# Altium PCB PCB1_rev2.PcbDoc
Units mil, origin at the board's own origin, x right, y up, seen from the top; angles counter-clockwise.
Board outline 3149.61 x 2940 mil, 6 copper layers (Top Layer, Layer 1, Layer 3, Layer 4, Layer 2, Bottom Layer), stack 32.112 mil thick; 63 components, 38 nets, 175 pads, 41 vias.
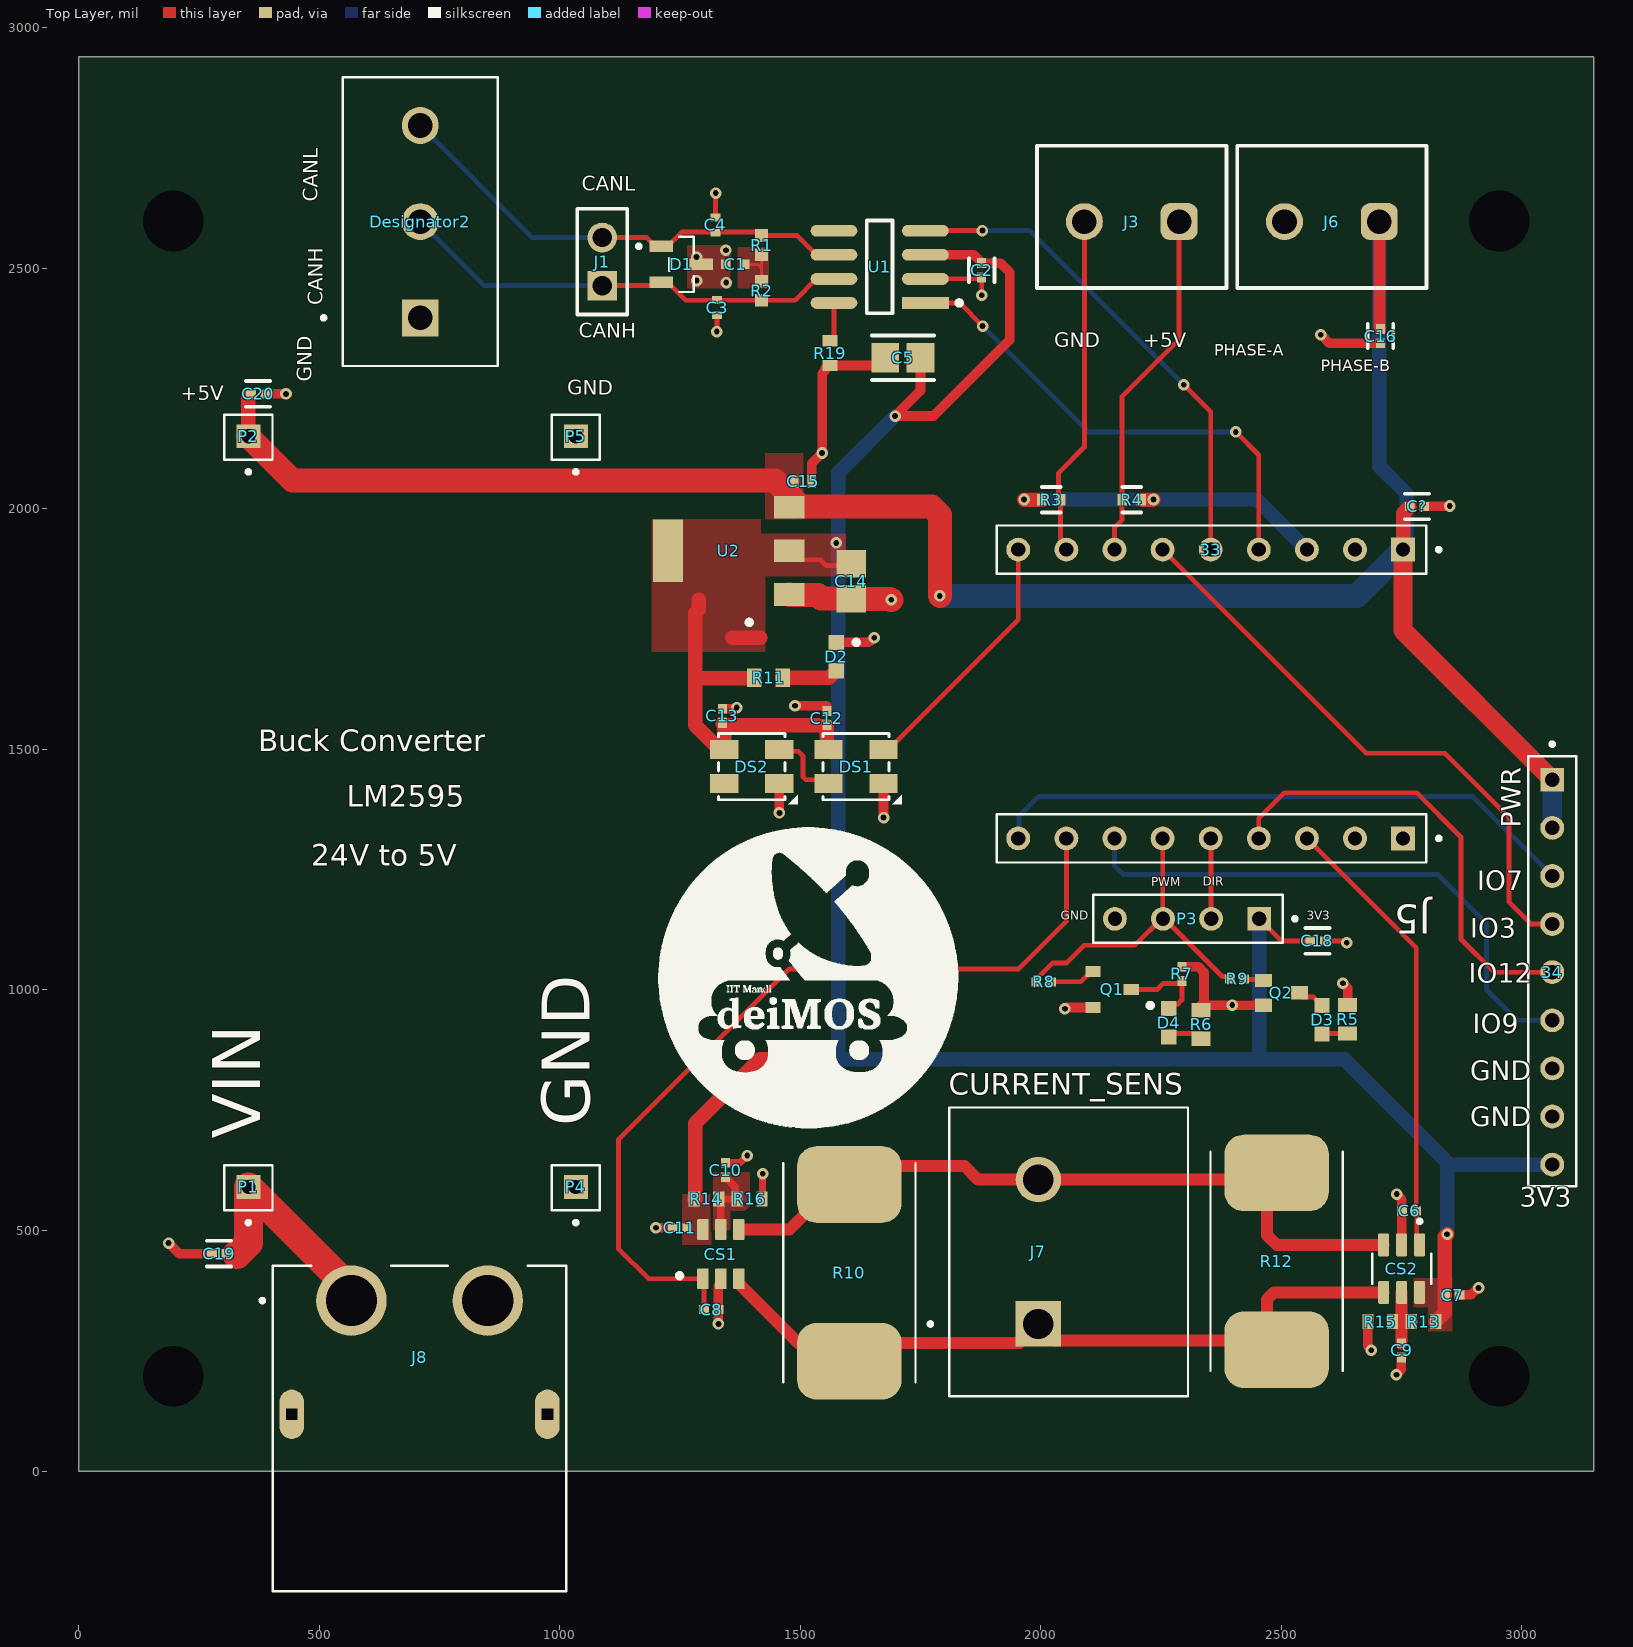
[diagram p0: Top Layer view]
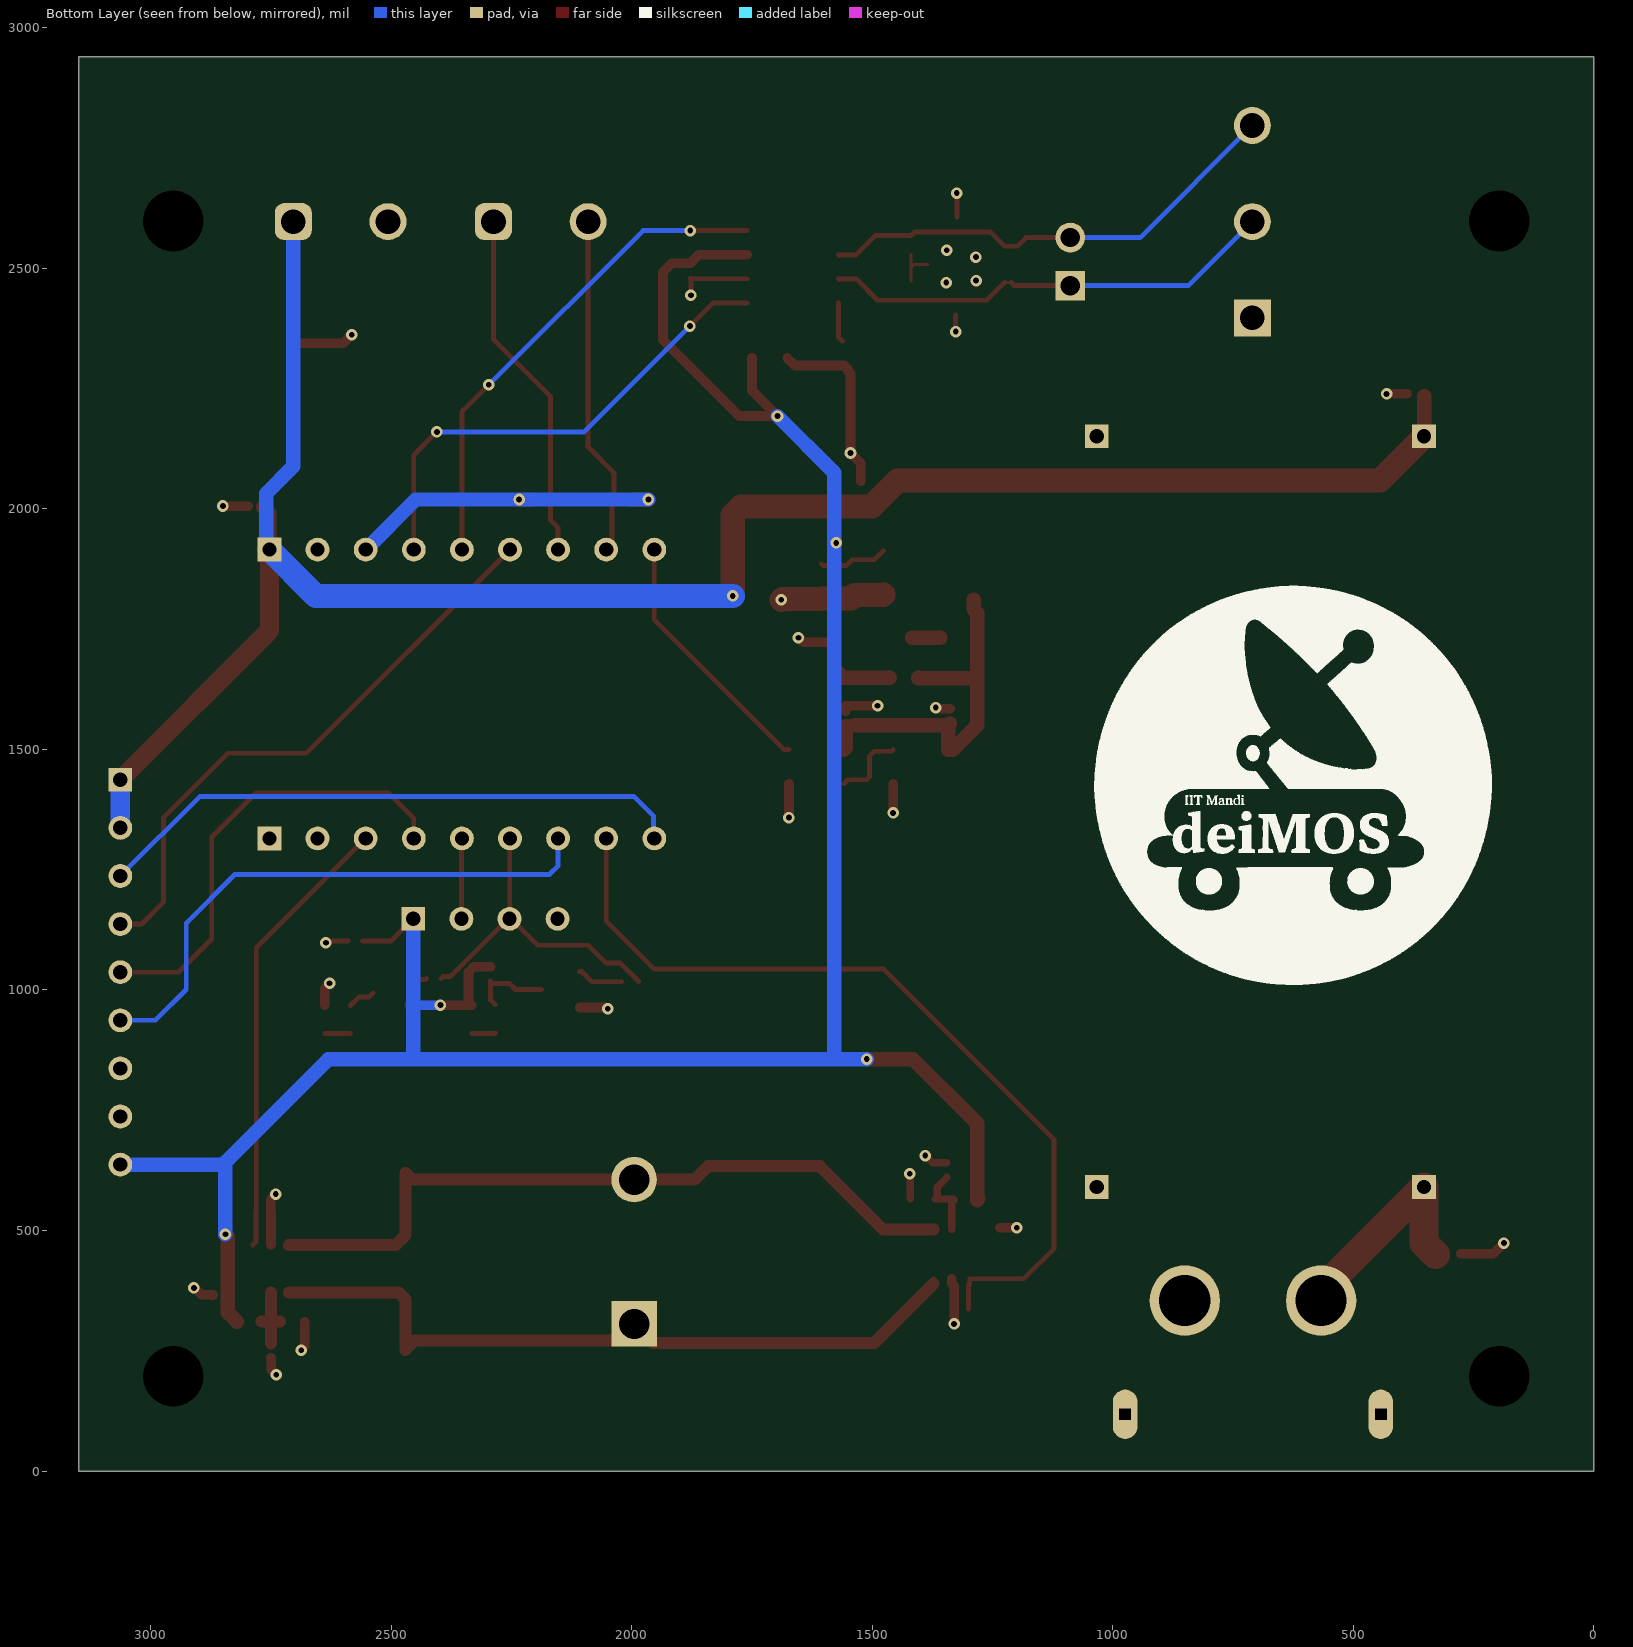
[diagram p1: Bottom Layer view, seen from below]
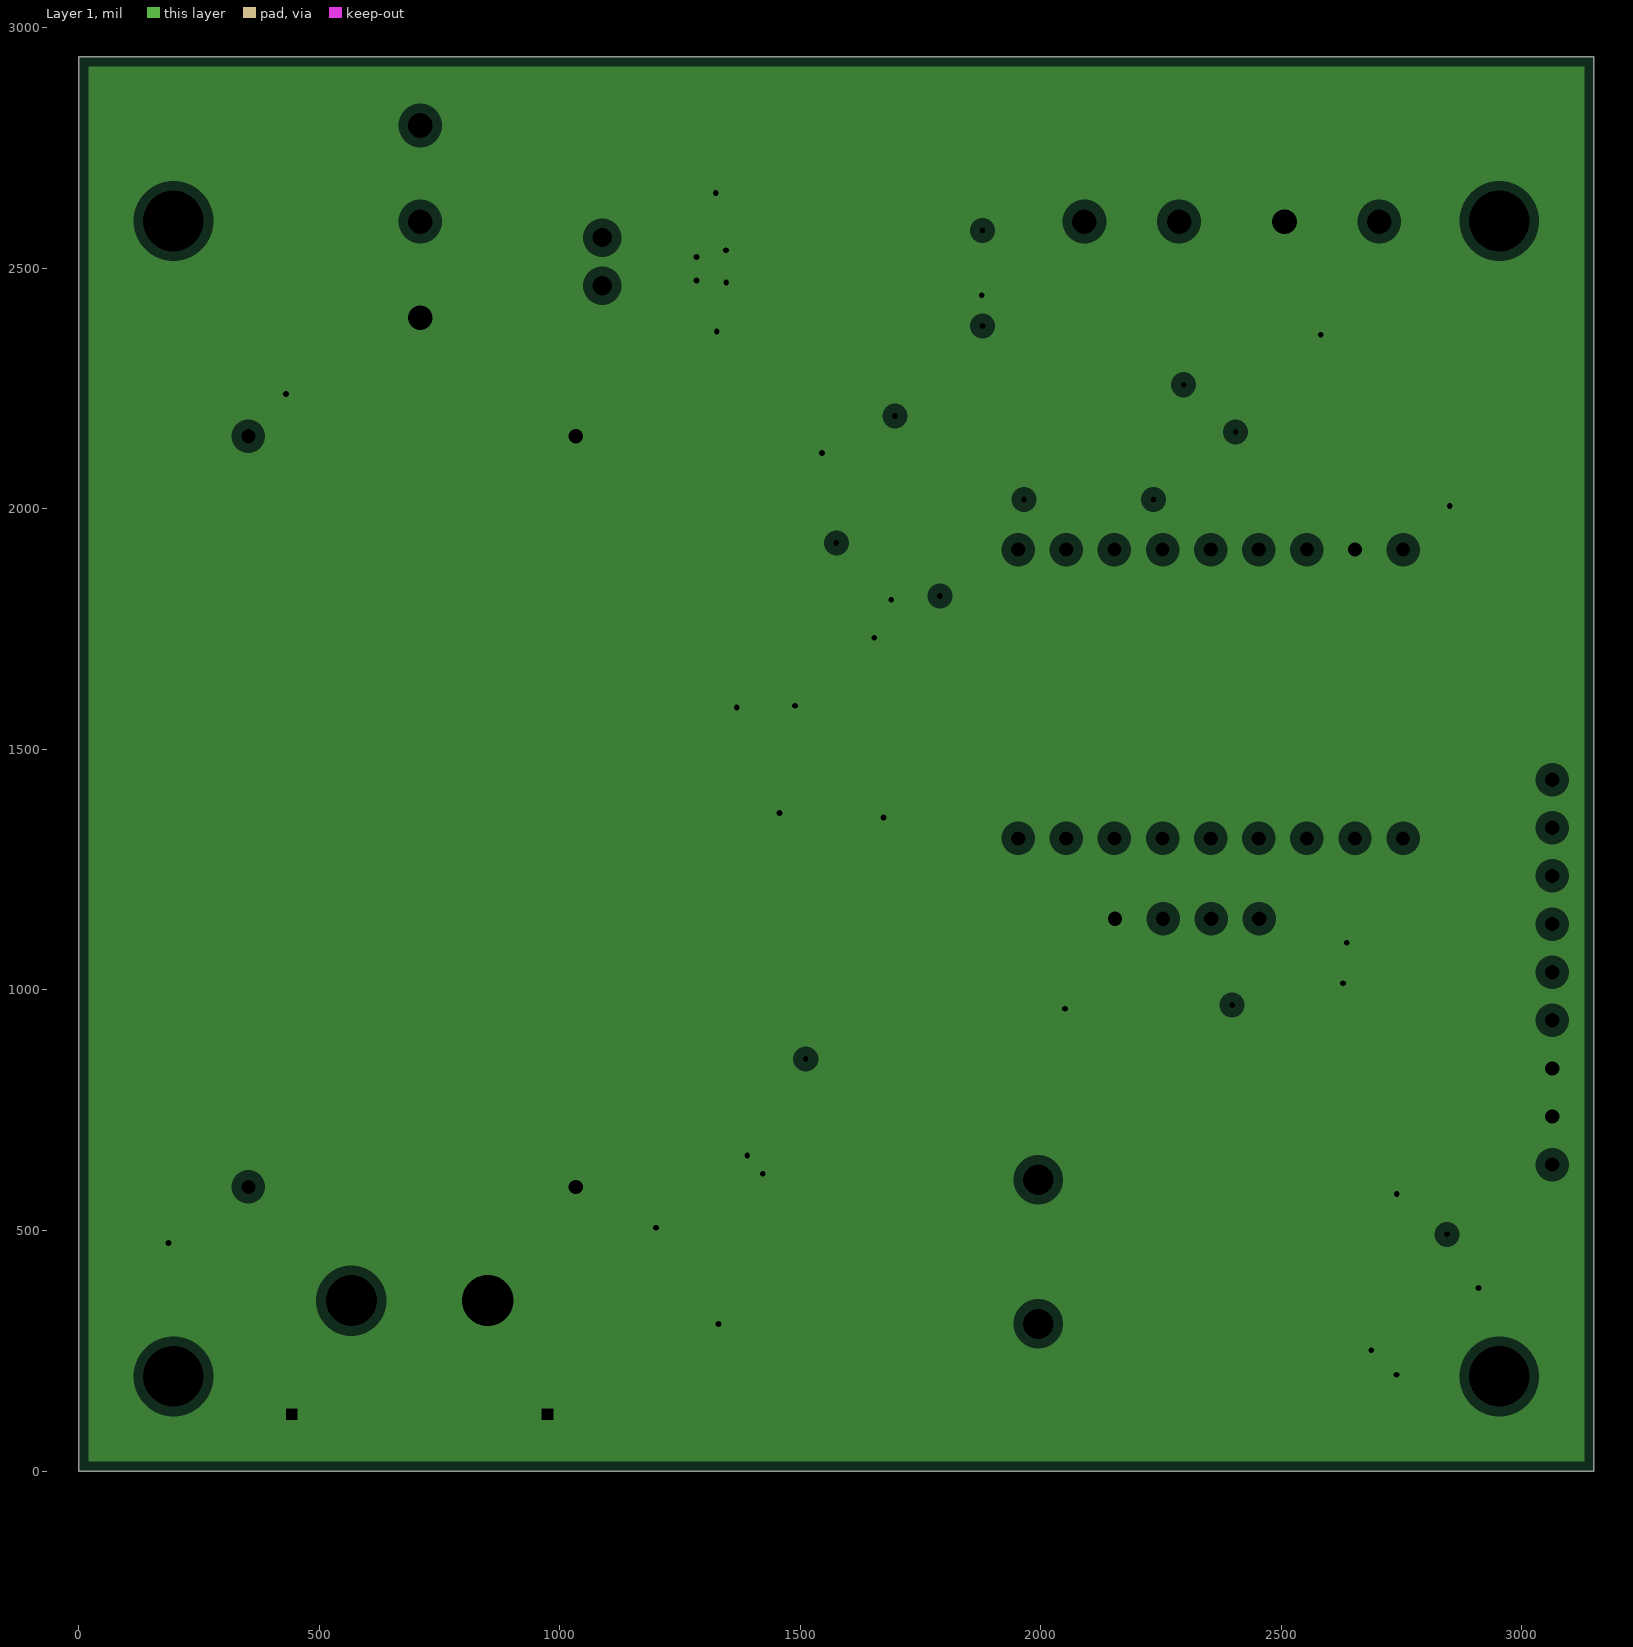
[diagram p2: Layer 1, clearances drawn from the general rule]
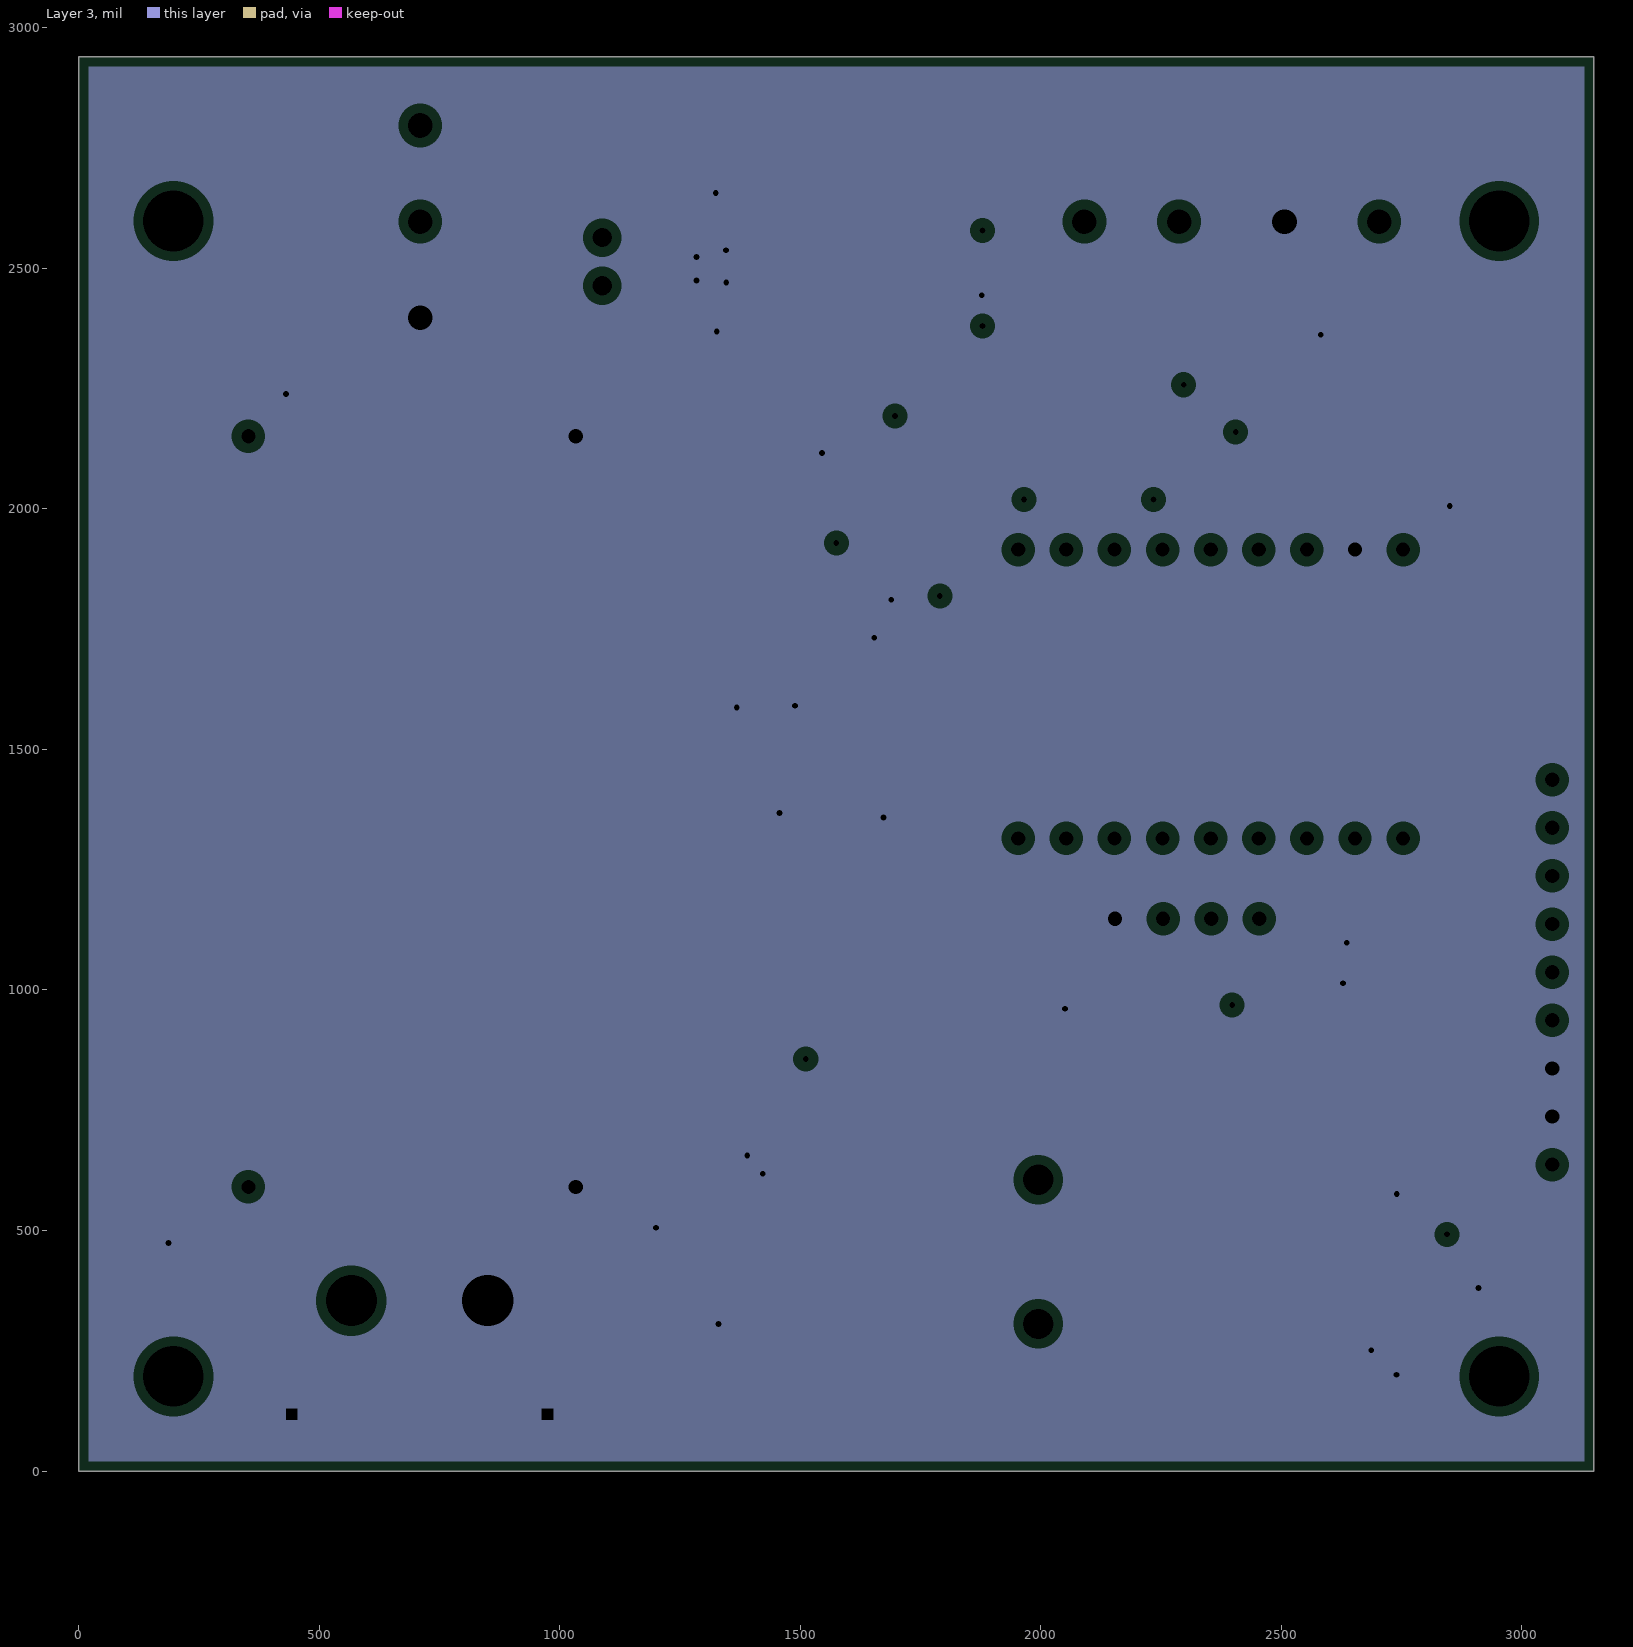
[diagram p3: Layer 3, clearances drawn from the general rule]
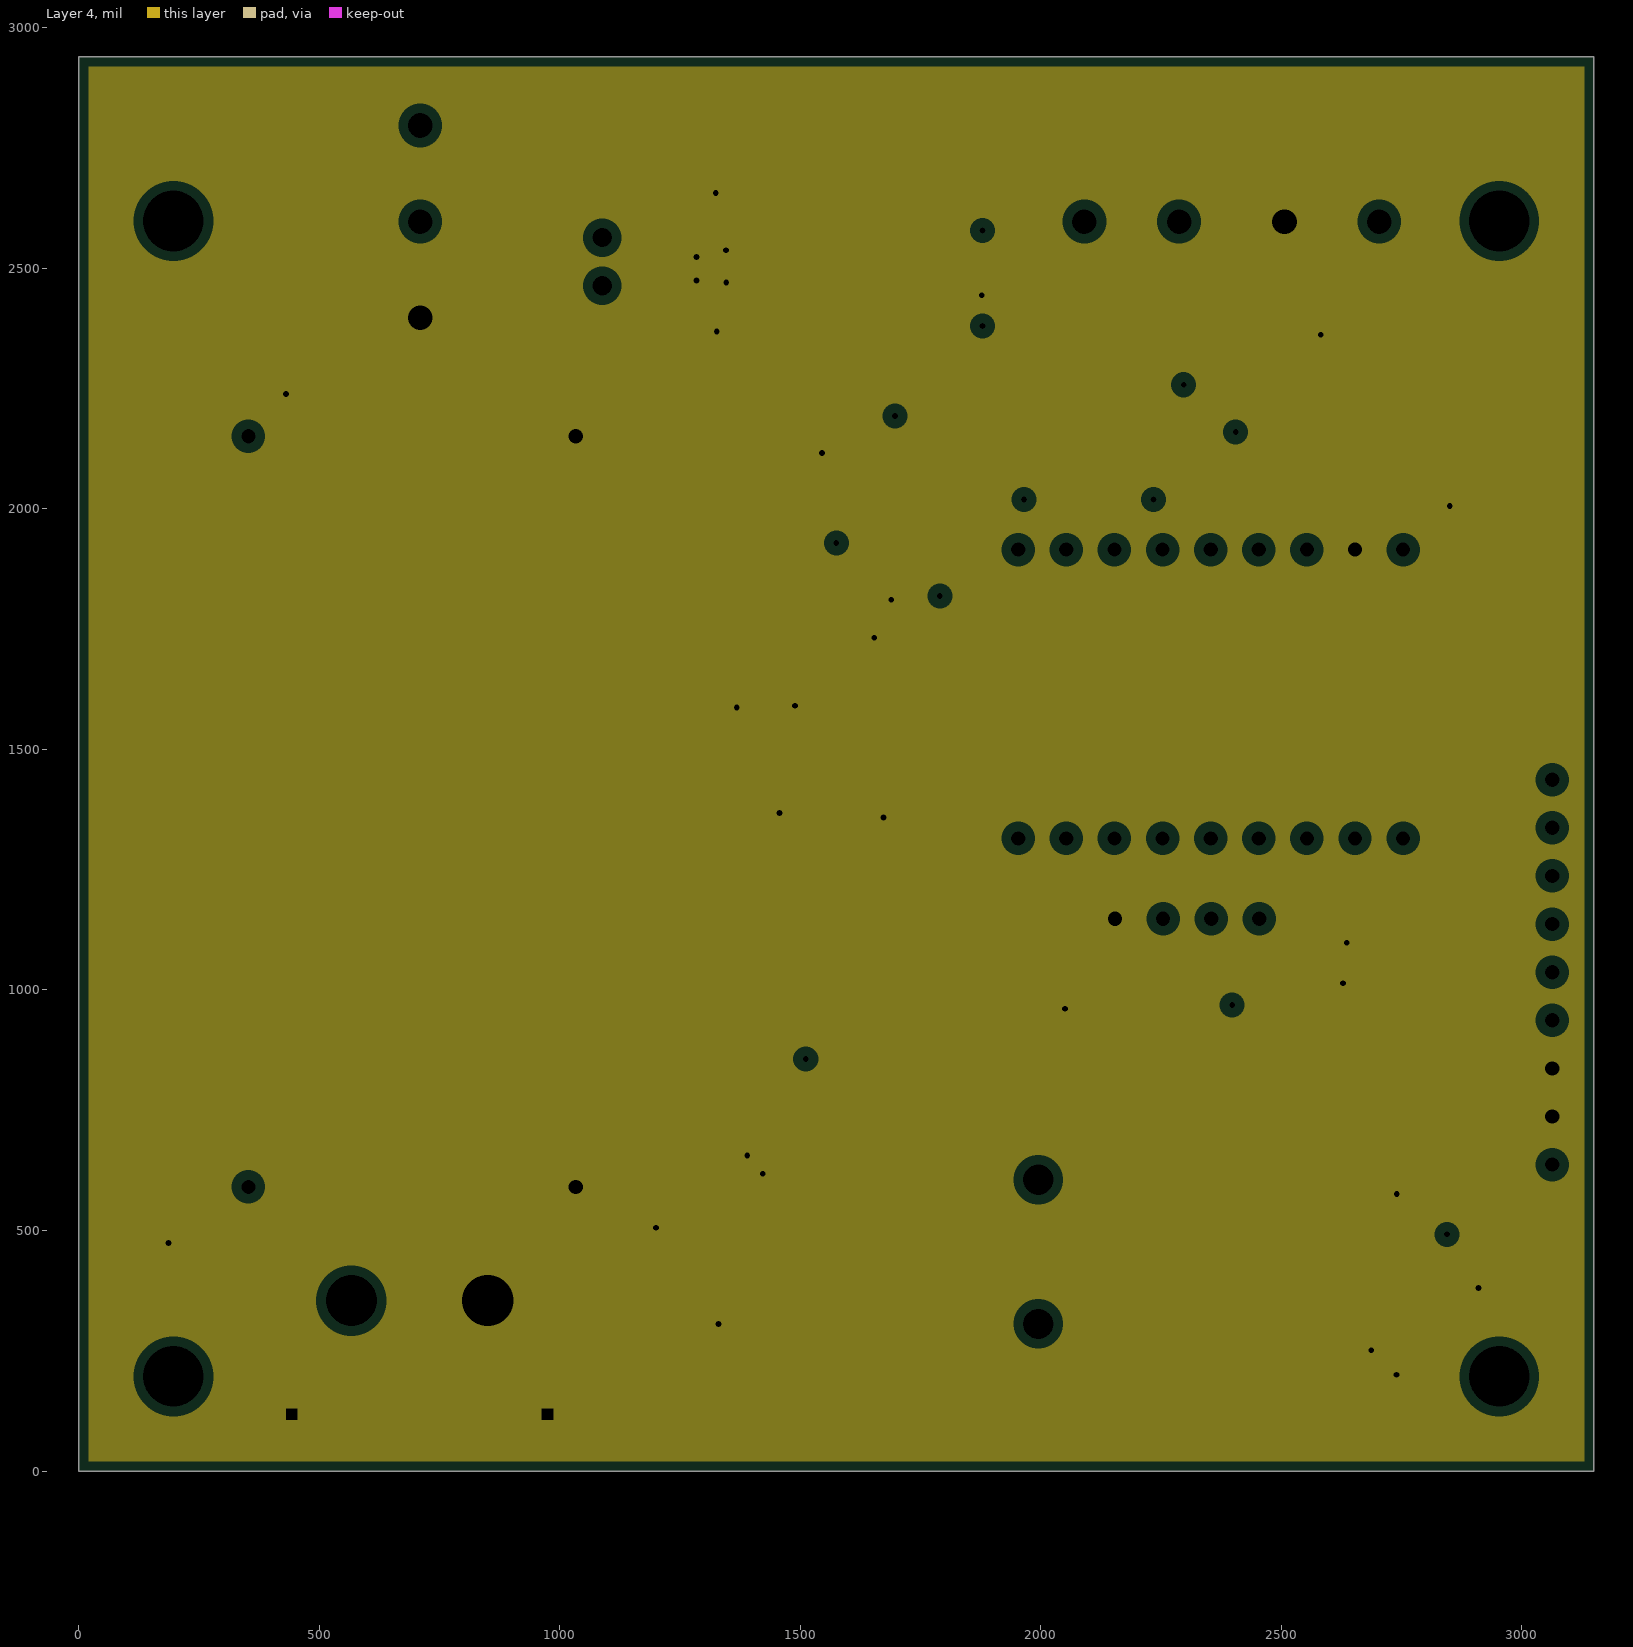
[diagram p4: Layer 4, clearances drawn from the general rule]
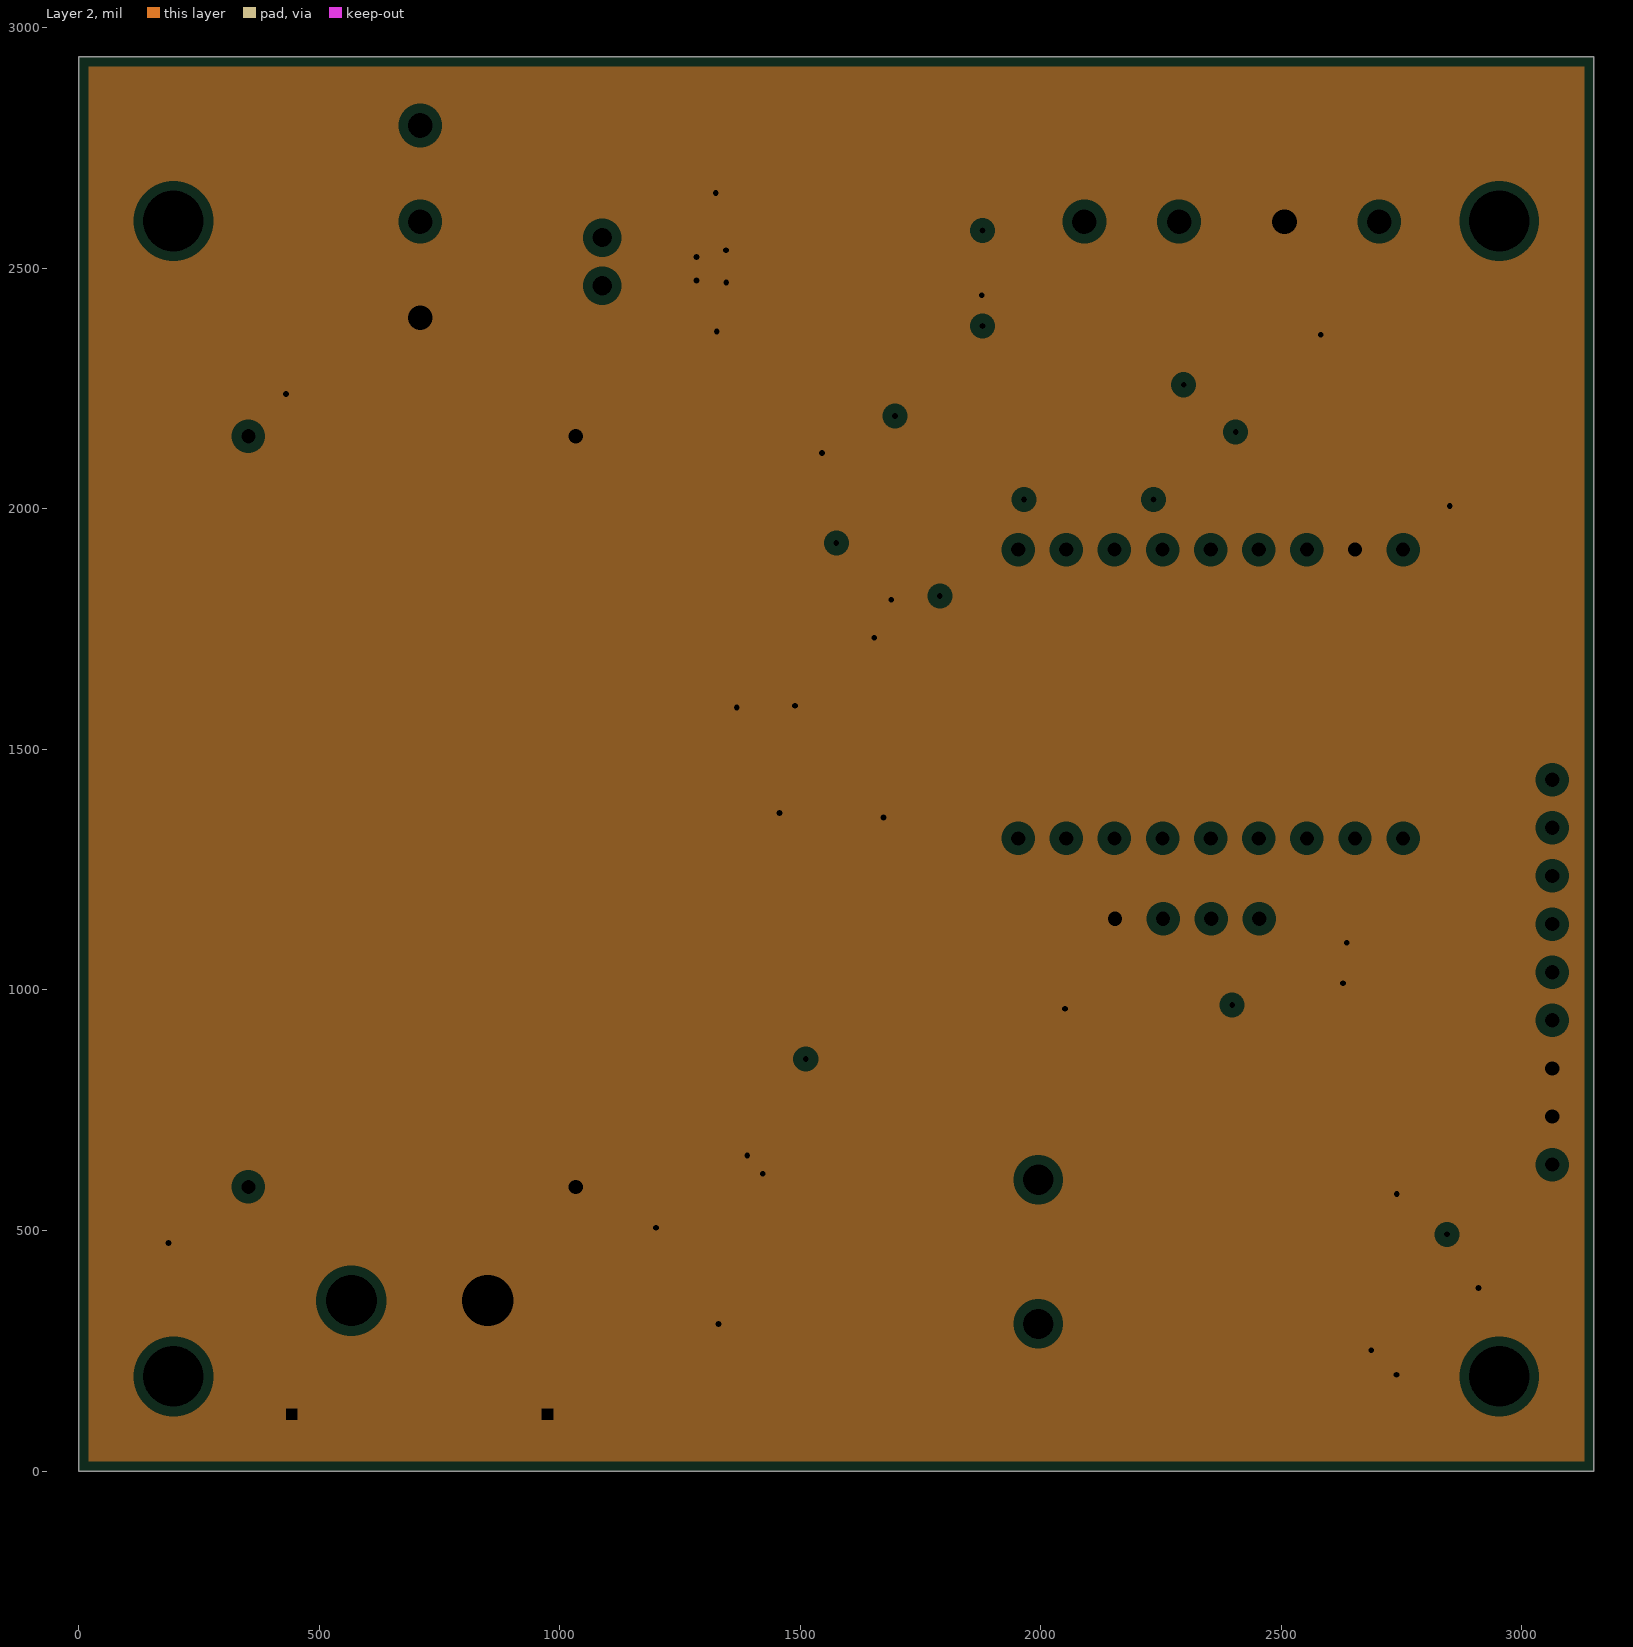
[diagram p5: Layer 2, clearances drawn from the general rule]
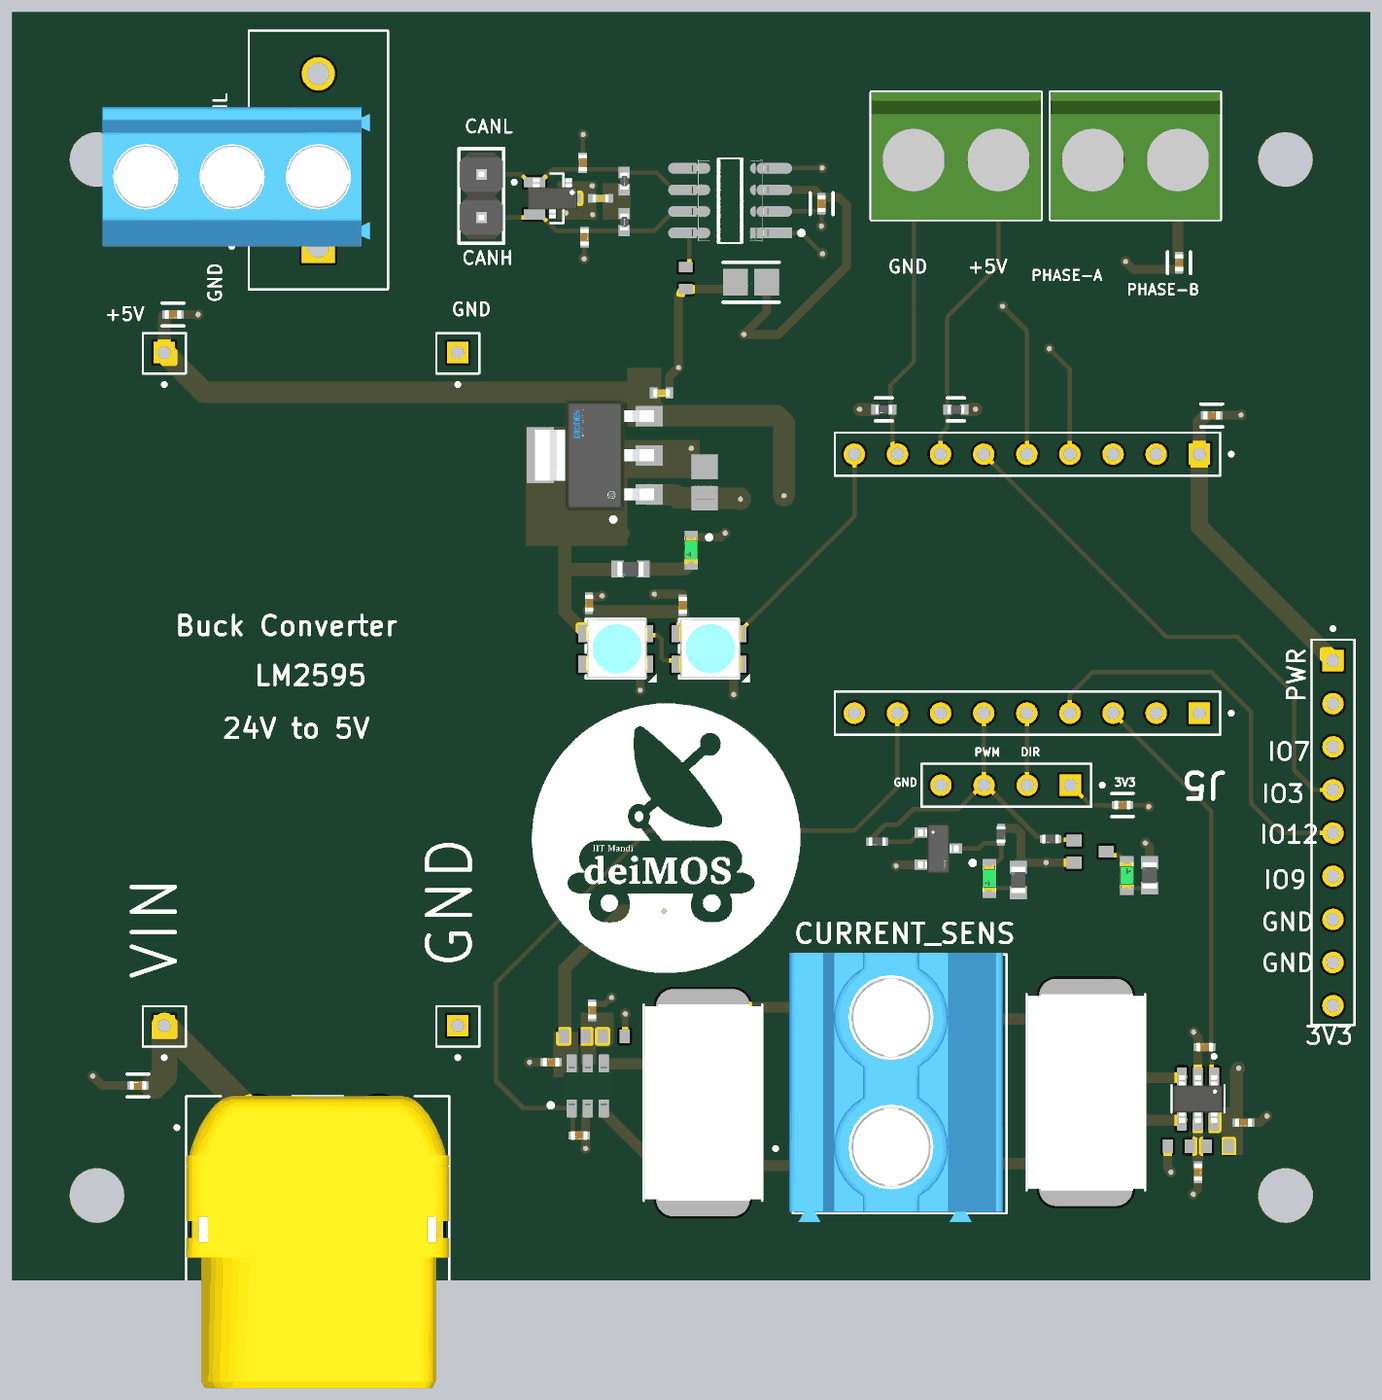
[diagram p6: 3D render of the assembled board from above, using the file's embedded part models]

## Layer stack, top to bottom
Top Solder: solder mask 0.4, Solder Resist, Dk 3.5
Top Layer: signal copper 1.4
Dielectric 2: prepreg 2.8, PP-006, Dk 4.1
Layer 1: plane copper 1.378, net GND
Dielectric 4: prepreg 2.8, PP-006, Dk 4.1
Layer 3: plane copper 1.378, net GND
Dielectric 1: dielectric 12.6, FR-4, Dk 4.8
Layer 4: plane copper 1.378, net GND
Dielectric 5: prepreg 2.8, PP-006, Dk 4.1
Layer 2: plane copper 1.378, net GND
Dielectric 3: prepreg 2.8, PP-006, Dk 4.1
Bottom Layer: signal copper 1.4
Bottom Solder: solder mask 0.4, Solder Resist, Dk 3.5

## Board outline
0,2940 0,0 3149.61,0 3149.61,2940

## Design rules (kind name [scope] priority, off if disabled: settings)
Clearance [All] p1: gap=6 ignorepadtopadclearanceinfootprint=FALSE
DiffPairsRouting [All] p1: maxlimit=10 minlimit=10 mostfreqgap=10 toplayer_minwidth=5 toplayer_maxwidth=15 toplayer_prefwidth=15 bottomlayer_minwidth=15 bottomlayer_maxwidth=15 bottomlayer_prefwidth=15 maxuncoupledlength=500
HoleSize [All] p1: absolutevalues=TRUE maxlimit=157.48 minlimit=1 maxpercent=80.000 minpercent=20.000
MinimumSolderMaskSliver [All] p1: minsoldermaskwidth=5.91
PlaneClearance [All] p1: clearance=20
PlaneConnect [All] p1: pad.planeconnectstyle=Relief pad.reliefexpansion=20 pad.reliefentries=4 pad.reliefconductorwidth=10 pad.reliefairgap=10 via.planeconnectstyle=Direct via.reliefexpansion=20 via.reliefentries=4 via.reliefconductorwidth=10 via.reliefairgap=10
PolygonConnect [All] p1: connectstyle=Direct reliefconductorwidth=10 reliefentries=4 polygonreliefangle="90 Angle" airgapwidth=10
RoutingVias [All] p1: holewidth=12 width=24 viastyle="Through Hole" minholewidth=12 minwidth=24 maxholewidth=12 maxwidth=24
SolderMaskExpansion [All] p1: expansion=6 istentingtop=FALSE
SupplyNets "Schematic Supply Nets_5" [InNet('3V3_2')] p1: voltage=0.000
SupplyNets "Schematic Supply Nets_4" [InNet('GND')] p2: voltage=0.000
SupplyNets "Schematic Supply Nets_3" [InNet('3V3')] p3: voltage=0.000
SupplyNets "Schematic Supply Nets_2" [InNet('+5')] p4: voltage=0.000
SupplyNets "Schematic Supply Nets" [InNet('VIN')] p5: voltage=0.000
Width [All] p1: maxlimit=60 minlimit=6 preferedwidth=10
25 further rules are at their usual default settings.

## Classes and differential pairs
component class Sheet1: C5 C12 C13 C14 C15 C16 D2 DS1 DS2 J3 J6 J8 P1 P2 P4 P5 R3 R4 R11 U2 U3 U4
component class "updated sheet_1": 33 C5 C6 C7 C8 C9 C10 C11 C18 CS1 CS2 D3 D4 J5 J7 P3 Q1 Q2 R5 R6 R7 R8 R9 R10 R12 R13 R14 R15 R16
component class CAN: C1 C2 C3 C4 C5 D1 J1 J5 R1 R2 R19 U1

## Components (designator, comment, footprint, x,y, rotation, side; value= is the part's Value field where it differs from the comment)
33 "2PH1-09-UA" "2AMPHENOL_76341-322LF - DUPLICATE" 1703,1915.35 r0 top
34 "2PH1-09-UA" "2AMPHENOL_76341-322LF - DUPLICATE" 3063,387 r90 top
C1 "CC0402KRX7R6BB472" FP-CC0402-MFG 1364.53,2508.32 r0 top value="4.7 nF"
C2 "CL05B104KP5NNNC" FP-CL17-IPC_C 1877,2496 r90 top
C3 "CL05C101JB5NNNC" FP-CL05-MFG 1327.32,2418.43 r90 top value=100pF
C4 "CL05C101JB5NNNC" FP-CL05-MFG 1323.32,2590.43 r270 top value=100pF
C5 "CL21A226MQQNNNE" FP-CL21-IPC_A 1713.45,2314 r0 top
C6 "CL05A104KA5NNNC" FP-CL278-IPC_C 2765.47,540.79 r180 top
C7 "CL05A104KA5NNNC" FP-CL278-IPC_C 2855.47,365.79 r0 top
C8 "CL05A104KA5NNNC" FP-CL278-IPC_C 1314.88,335.79 r0 top
C9 "CL05A104KA5NNNC" FP-CL278-IPC_C 2749.88,250.79 r90 top
C10 "CL05A104KA5NNNC" FP-CL278-IPC_C 1344.88,625.79 r270 top
C11 "CL05A104KA5NNNC" FP-CL278-IPC_C 1249.88,505.79 r180 top
C12 "CL05A104KA5NNNC" FP-CL278-IPC_C 1555.12,1564.96 r270 top
C13 "CL05A104KA5NNNC" FP-CL278-IPC_C 1337.88,1569.6 r270 top
C14 "CL21A226MQQNNNE" FP-CL21-IPC_A 1606,1849.55 r270 top
C15 "CL05A106MP5NUNC" FP-CL05A106MP5NUNC-MFG 1505.91,2057.09 r0 top value=10uF
C16 "CL05A104KA5NNNC" FP-CL278-IPC_C 2706,2359 r270 top
C18 "CL05A104KA5NNNC" FP-CL278-IPC_C 2575,1102 r180 top
C19 "CL05A104KA5NNNC" FP-CL278-IPC_C 292,452 r180 top
C20 "CL05A104KA5NNNC" FP-CL278-IPC_C 373,2239 r0 top
C? "CL05A104KA5NNNC" FP-CL278-IPC_C 2781.9,2005 r180 top
CS1 "INA181A1IDBVR" FP-DBV0006A-MFG 1334.88,450.79 r90 top
CS2 "INA181A3IDBVR" SOT95P280X145-6N 2749.88,420.79 r270 top
D1 "ESD2CAN24DBZRQ1" SOT95P237X112-3N 1252.99,2508.32 r0 top
D2 "VLMS1300-GS08" FP-6_541-5092_01-4-MFG 1574.8,1692.91 r270 top
D3 "VLMS1300-GS08" FP-6_541-5092_01-4-MFG 2584.52,938.38 r90 top
D4 "VLMS1300-GS08" FP-6_541-5092_01-4-MFG 2265.89,931.72 r270 top
Designator2 "Comment" CUI_TB006-508-03BE 710,2397 r90 top
DS1 "SK6812MINI-HS" LED 1614.17,1466.54 r0 top
DS2 "SK6812MINI-HS" LED 1397.64,1466.54 r0 top
J1 "M20-9990246" FP-M20-9990246-MFG 1088.32,2514 r90 top
J3 "691137710002" 691137710002 2189,2607 r180 top
J5 "2PH1-09-UA" "2AMPHENOL_76341-322LF - DUPLICATE" 1703,1315 r0 top
J6 "691137710002" 691137710002 2605,2607 r180 top
J7 "TB005-762-02BE" CUI_TB005-762-02BE 1994.88,305.79 r90 top
J8 "XT60PW-F" AMASS_XT60PW-F 708.66,354.33 r0 top
P1 "Header-Male-2.54_1x1" PCBCOMPONENT_1 352.9,590.55 r270 top
P2 "Header-Male-2.54_1x1" PCBCOMPONENT_1 352.9,2150.79 r270 top
P3 "Header-Female-2.54_1x4" "4 PIN CONNECTOR MALE" 1554,993 r0 top
P4 "Header-Male-2.54_1x1" PCBCOMPONENT_1 1033.46,590.55 r270 top
P5 "Header-Male-2.54_1x1" PCBCOMPONENT_1 1033.46,2150.79 r270 top
Q1 "SS8050-G" FP-SS8050-G-MFG 2148,1001 r0 top
Q2 "SMMBT3906WT1G" ONSC-SC-70-3-419-04_V 2500,994.09 r0 top
R1 "ERJ-2RKF60R4X" FP-ERJ2RK-IPC_A 1419.53,2548.32 r270 top
R2 "ERJ-2RKF60R4X" FP-ERJ2RK-IPC_A 1419.53,2453.32 r90 top
R3 "RC0402JR-074K7L" FP-RC0402-0_4-MFG 2021.36,2019 r180 top
R4 "RC0402JR-074K7L" FP-RC0402-0_4-MFG 2188.68,2019 r0 top
R5 "CRCW06031K00FKEA" FP-CRCW0603-e3-MFG 2637.8,938.98 r90 top
R6 "CRCW06031K00FKEA" FP-CRCW0603-e3-MFG 2333.32,928.28 r90 top
R7 "RC0402JR-0710KL" FP-RC0402-0_4-IPC_C 2293.31,1033.46 r270 top
R8 "RC0402JR-0710KL" FP-RC0402-0_4-IPC_C 2006,1017 r180 top
R9 "RC0402JR-0710KL" FP-RC0402-0_4-IPC_C 2408,1023 r180 top
R10 "WSR32L000FEA" RESM11569X253N 1602,412 r90 top value=2mR
R11 "CRCW06031K00FKEA" FP-CRCW0603-e3-MFG 1434,1649 r180 top
R12 "WSR32L000FEA" RESM11569X253N 2490,436 r90 top value=2mR
R13 "RC0603FR-1010KL" RESC1608X55X25LL10T15 2795.47,310.79 r0 top
R14 "RC0603FR-1010KL" RESC1608X55X25LL10T15 1304.88,565.79 r180 top
R15 "RC0603FR-1010KL" RESC1608X55X25LL10T15 2705.47,310.79 r0 top
R16 "RC0603FR-1010KL" RESC1608X55X25LL10T15 1394.88,565.79 r180 top
R19 "RC0603FR-1010KL" RESC1608X55X25LL10T15 1562,2323.59 r90 top
U1 "SN65HVD230DR" FP-D0008A-IPC_A 1665,2503 r180 top
U2 "AZ1117CH-3.3TRG1" FP-SOT223-MFG 1350.88,1912.79 r180 top

## Footprints (in the part's own frame and the unit in brackets; to place one, negate y for a bottom-side part, rotate by r counter-clockwise, add the part's x,y. Pads: shape width x height; smd on the part's side, far side on the other; paste and mask are expansions set on the pad)
"2AMPHENOL_76341-322LF - DUPLICATE" [mm]
  rect 1.258x1.258 / inner round 1.258 / far side rect 1.258x1.258 hole 0.75: 1(26.67,0)
  round 1.258 hole 0.75: 2(24.13,0) 3(21.59,0) 4(19.05,0) 5(16.51,0) 6(13.97,0) 7(11.43,0) 8(8.89,0) 9(6.35,0)
  silkscreen extent 5.21,-1.27 28.65,1.27
"4 PIN CONNECTOR MALE" [mil]
  rect 49.53x49.53 / inner round 49.53 / far side rect 49.53x49.53 hole 29.53: 1(900,155)
  round 49.53 hole 29.53: 2(800,155) 3(700,155) 4(600,155)
  silkscreen extent 555,105 978,205
691137710002 [mm] "Horizontal Cable Entry with Pressure Clamp, pitch 5mm, 02p"
  rrect50% 1.95x1.95 hole 1.3: 1(-2.5,0.25)
  round 1.95 hole 1.3: 2(2.5,0.25)
  silkscreen extent -5,-3.75 5,3.75, body extent -5,-3.75 5,3.75, height 11.6
AMASS_XT60PW-F [mm]
  round 3.716 hole 2.7: 1(-3.6,0) 2(3.6,0)
  oval 1.3x2.6 hole 0.6 square: S1(-6.75,-6) S2(6.75,-6)
  silkscreen extent -8.4,-15.35 7.75,1.85, body extent -7.75,-15.35 7.75,1.85, height 8.4
CUI_TB005-762-02BE [mm]
  rect 2.4x2.4 / inner round 2.4 / far side rect 2.4x2.4 hole 1.6: 1(0,0)
  round 2.4 hole 1.6: 2(7.62,0)
  silkscreen extent -3.81,-7.9 11.43,5.8, body extent -4.32,-7.7 11.52,4.9, height 21.7
CUI_TB006-508-03BE [mm]
  rect 1.95x1.95 / inner round 1.95 / far side rect 1.95x1.95 hole 1.3: 1(0,0)
  round 1.95 hole 1.3: 2(5.08,0) 3(10.16,0)
  silkscreen extent -2.54,-4.1 12.7,5.2, body extent 0,-3.04 8.2,12.7, height 10
FP-6_541-5092_01-4-MFG [mm]
  rect 0.8x0.8 smd paste+0 mask+0: 1(-0.75,0) 2(0.75,0)
  silkscreen extent -0.87,0.93 -0.63,1.18, body extent -1.25,-0.6 1.25,0.6, height 0.25
FP-CC0402-MFG [mm]
  rect 0.5x0.5 smd paste+0 mask+0: 1(-0.5,0) 2(0.5,0)
  body extent -0.87,-0.48 0.87,0.48, height 0.25
FP-CL05-MFG [mm]
  rect 0.42x0.525 smd paste+0 mask+0: 1(-0.397,0) 2(0.397,0)
  body extent -0.71,-0.38 0.71,0.38, height 0.25
FP-CL05A106MP5NUNC-MFG [mm]
  rect 0.45x0.675 smd paste+0 mask+0: 1(-0.463,0) 2(0.463,0)
  body extent -0.79,-0.45 0.79,0.45, height 0.25
FP-CL17-IPC_C [mil]
  rect 20.29x18.6 smd paste+0 mask+0: 1(-14.9,0) 2(14.9,0)
  silkscreen extent -25,-27 25,27, body extent -29,-15 29,15, height 10
FP-CL21-IPC_A [mil]
  rect 57.27x61.27 smd paste+0 mask+0: 1(-36.45,0) 2(36.45,0)
  silkscreen extent -65,-46 65,46, body extent -85,-50 85,50, height 10
FP-CL278-IPC_C [mil]
  rect 20.29x18.6 smd paste+0 mask+0: 1(-14.9,0) 2(14.9,0)
  body extent -29,-15 29,15, height 10
FP-CRCW0603-e3-MFG [mm]
  rect 0.75x1 smd paste+0 mask+0: 1(-0.75,0) 2(0.75,0)
  body extent -1.22,-0.6 1.22,0.6, height 0.25
FP-D0008A-IPC_A [mil]
  rect 97.21x24.49 smd paste+0 mask+0: 1(-95.02,75)
  rrect100% 97.21x24.49 smd paste+0 mask+0: 2(-95.02,25) 3(-95.02,-25) 4(-95.02,-75) 5(95.02,-75) 6(95.02,-25) 7(95.02,25) 8(95.02,75)
  silkscreen extent -170,-97 27,97, body extent -163,-116 163,116, height 10
FP-DBV0006A-MFG [mm]
  rrect17% 1.1x0.6 smd paste+0 mask+0: 1(-1.3,0.95) 2(-1.3,0) 3(-1.3,-0.95) 4(1.3,-0.95) 5(1.3,0) 6(1.3,0.95)
  silkscreen extent -1.26,2.06 -1.01,2.31, body extent -1.95,-1.78 1.95,1.78, height 0.25
FP-ERJ2RK-IPC_A [mil]
  rect 26.31x26.48 smd paste+0 mask+0: 1(-19.77,0) 2(19.77,0)
  body extent -41,-21 41,21, height 10
FP-M20-9990246-MFG [mm]
  rect 1.57x1.57 hole 1.02 paste-2539.97 mask+0: 1(-1.27,0)
  round 1.57 hole 1.02 paste-2539.97 mask+0: 2(1.27,0)
  silkscreen extent -2.79,-1.32 2.79,1.32, body extent -2.89,-1.42 2.89,1.42, height 0.25
FP-RC0402-0_4-IPC_C [mil]
  rect 20.29x18.6 smd paste+0 mask+0: 1(-14.9,0) 2(14.9,0)
  body extent -29,-15 29,15, height 10
FP-RC0402-0_4-MFG [mm]
  rect 0.5x0.6 smd paste+0 mask+0: 1(-0.5,0) 2(0.5,0)
  silkscreen extent -0.5,-0.67 0.5,0.67, body extent -0.85,-0.4 0.85,0.4, height 0.25
FP-SOT223-MFG [mm]
  rect 1.6x1.2 smd paste+0 mask+0: 1(-3.2,2.3) 2(-3.2,0) 3(-3.2,-2.3)
  rect 1.6x3.3 smd paste+0 mask+0: 4(3.2,0)
  silkscreen extent -1.22,3.65 -0.97,3.9, body extent -4.1,-3.37 4.1,3.37, height 0.25
FP-SS8050-G-MFG [mm]
  rect 0.8x0.6 smd paste+0 mask+0: 1(-1.01,0.95) 2(-1.01,-0.95) 3(1.01,0)
  body extent -1.51,-1.6 1.51,1.6, height 0.25
LED [mm]
  rect 1.5x1 smd: 1(1.491,-0.96) 2(1.491,0.841) 3(-1.409,0.841) 4(-1.409,-0.96)
  silkscreen extent -1.71,-2.03 2.46,1.69, body extent -1.72,-1.8 1.98,1.7, height 1
ONSC-SC-70-3-419-04_V [mm] "SOT23, 3-Leads, Body 2x1.25mm, Pitch 0.65mm"
  rect 0.9x0.7 smd: 1(-0.95,0.65) 2(-0.95,-0.65) 3(0.95,0)
  body extent -0.63,-1 0.63,1, height 1
PCBCOMPONENT_1 [mm]
  rect 1.258x1.258 / inner round 1.258 / far side rect 1.258x1.258 hole 0.75: 1(0,0)
  silkscreen extent -1.14,-1.27 1.98,1.27
RESC1608X55X25LL10T15 [mm] "Chip Resistor, 2-Leads, Body 1.60x0.80mm, IPC High Density"
  rect 0.6x0.8 smd: 1(-0.65,0) 2(0.65,0)
  body extent -0.85,-0.45 0.85,0.45, height 0.55
RESM11569X253N [mm]
  rrect50% 4.04x5.51 smd: 1(-4.665,0) 2(4.665,0)
  silkscreen extent -5.78,-3.49 5.78,3.49, body extent -5.78,-3.56 5.78,3.42, height 2.42
SOT95P237X112-3N [mm]
  rect 1.24x0.59 smd: 1(-1.055,0.95) 2(-1.055,-0.95) 3(1.055,0)
  silkscreen extent -2.35,-1.46 0.65,1.46, body extent -1.18,-1.46 1.18,1.46, height 1.12
SOT95P280X145-6N [mm]
  rrect25% 1.21x0.58 smd: 1(-1.255,0.95) 2(-1.255,0) 3(-1.255,-0.95) 4(1.255,-0.95) 5(1.255,0) 6(1.255,0.95)
  silkscreen extent -2.6,-1.56 0.8,1.56, body extent -1.4,-1.45 1.4,1.45, height 1.45

## Part data
33 34: "Conn Unshrouded Header HDR 9 POS 2mm Solder ST Thru-Hole", Contact Resistance=20mΩ, Current Rating=1A, Insulation Resistance=5GΩ, Manufacturer="Adam Tech", Max Operating Temperature=105°C, Min Operating Temperature=-55°C, Supplier Part Number=2057-2PH1-09-UA-ND, Category="Card Edge Connectors", ComponentLink1Description=https://datasheet.octopart.com:443/2PH1-09-UA-Adam-Tech-datasheet-21182828.pdf?src-supplier=IHS, ComponentLink1URL=https://datasheet.octopart.com:443/2PH1-09-UA-Adam-Tech-datasheet-21182828.pdf?src-supplier=IHS, ComponentLink2Description=https://datasheet.octopart.com:443/2PH1-09-UA-Adam-Tech-datasheet-12511781.pdf?src-supplier=Future+Electronics, ComponentLink2URL=https://datasheet.octopart.com:443/2PH1-09-UA-Adam-Tech-datasheet-12511781.pdf?src-supplier=Future+Electronics, ComponentLink3Description=http://sigma.octopart.com:80/rohs_statement/Adam-Tech-company-22.pdf?src-supplier=Compliance+Statements, ComponentLink3URL=http://sigma.octopart.com:80/rohs_statement/Adam-Tech-company-22.pdf?src-supplier=Compliance+Statements, ComponentLink4Description=http://sigma.octopart.com:80/reach_statement/Adam-Tech-company-23.pdf?src-supplier=Compliance+Statements, ComponentLink4URL=http://sigma.octopart.com:80/reach_statement/Adam-Tech-company-23.pdf?src-supplier=Compliance+Statements, Contact Gender=Male, Contact Material=Brass, Lead Free="Lead Free", Lifecycle Status=Production, Manufacturer Part Number=2PH1-09-UA, Number of Rows=1, Pins=9, Pricing="1=0.17, 10=0.141, 100=0.1195, 500=0.1066, 1000=0.10151, 5000=0.0906, 10000=0.08627 (USD)", REACH SVHC=Yes, RoHS=Compliant, Stock=1766, Supplier=DigiKey, Terminal Pitch=2mm
C1: library part CMP-03422-001343-1, "CC0402 4.7 nF X7R 10.00% 10 V", Capacitance="4.7 nF", Manufacturer=YAGEO, Package=CC0402, Temperature="-55°C to +125°C", Temperature Characteristic=X7R, Temperature Coefficient=30ppm/°C, Temperature Range High=+125°C, Temperature Range Low=-55°C, Tolerance=0.1, Voltage Rating="10 V", Automotive=No, Automotive Grade=NA, Category=Cap, ComponentLink2Description=Datasheet, ComponentLink2URL=http://www.yageo.com/documents/recent/UPY-GP_NP0_16V-to-50V_16.pdf, Device Class L1="Passive Components", Device Class L2=Capacitors, Device Class L3="Ceramic Capacitors", Footprint Url=http://www.yageo.com/exep/pages/download/literatures/UPY-C_GEN_24.pdf, Height=0.55mm, Ipc Land Pattern Name=CAPC10050X50, Lead Free=Yes, Manufacturer Part Number=CC0402KRX7R6BB472, Material=Ceramic, Mouser Description="Cap Ceramic 0.0047uF 10V X7R 10% SMD 0402 125°C Paper T/R", Octopart=https://octopart.com/cc0402krx7r6bb472-yageo-90326733, RoHS=TRUE
C2: library part CMP-13271-001069-1, "Cap Ceramic 100nF 10V X7R ±10% SMD 0402 +125°C Paper T/R", Capacitance=100nF, Case Code (Imperial)=0402, Case Code (Metric)=1005, Dielectric=X7R, Max Operating Temperature=125°C, Min Operating Temperature=-55°C, Package Quantity=1, Tolerance=10%, Voltage Rating=10V, Case/Package=0402, Contact Plating=Tin, Depth=0.5mm, Height=0.5mm, Length=1mm, Mount="Surface Mount", Packaging="Tape and Reel", Radiation Hardening=No, Thickness=0.022inch, Width=0.02inch
C3 C4: library part CMP-13271-000010-1, "CAP CER 100PF 50V C0G/NP0 0402", Capacitance=100pF, Manufacturer=Samsung, Package=CL05, Temperature="-55°C to +125°C", Temperature Characteristic=C0G, Temperature Coefficient=30ppm/°C, Temperature Range High=+125°C, Temperature Range Low=-55°C, Tolerance=5%, Voltage Rating=50V, Automotive=No, Category=Cap, ComponentLink2Description=Datasheet, ComponentLink2URL=http://www.samsungsem.com/global/front/downloadcms.do?path=%2F%2Fglobal%2F%2Fsupport%2F%2Fproduct-search%2F%2Fmlcc%2F%2F__icsFiles%2F%2Fafieldfile%2F%2F2019%2F%2F06%2F%2F18&fileName=CL05C101JB5NNNC-19.pdf, Device Class L1="Passive Components", Device Class L2=Capacitors, Device Class L3="Ceramic Capacitors", Digikey Description="CAP CER 100PF 50V C0G/NP0 0402", Height=0.55mm, Ipc Land Pattern Name=CAPC10050X50, Lead Free=Yes, Manufacturer Part Number=CL05C101JB5NNNC, Material=Ceramic, Octopart=https://octopart.com/cl05c101jb5nnnc-samsung-9299367, RoHS=TRUE
C5 C14: library part CMP-13271-000185-1, "CL21 Series 0805 22uF 6.3V ±20% Tolerance X5R Multilayer Ceramic Chip Capacitor", Capacitance=22uF, Case Code (Imperial)=0805, Case Code (Metric)=2012, Dielectric=X5R, Max Operating Temperature=85°C, Min Operating Temperature=-55°C, Package Quantity=2000, Tolerance=20%, Voltage Rating=6.3V, Case/Package=0805, Contact Plating=Tin, Depth=1.25mm, Height=1.25mm, Lead Free="Lead Free", Length=2mm, Mount="Surface Mount", Packaging="Tape and Reel", Radiation Hardening=No, Thickness=0.055inch, Voltage Rating (DC)=6.3V, Width=0.049inch
C6 C7 C8 C9 C10 C11 C12 C13 C16 C18 C19 C20 C?: library part CMP-13271-000728-1, "Cap Ceramic 100nF 25V X5R ±10% SMD 0402 +85°C Paper T/R", Capacitance=100nF, Case Code (Imperial)=0402, Case Code (Metric)=1005, Dielectric=X5R, Max Operating Temperature=85°C, Min Operating Temperature=-55°C, Package Quantity=1, Tolerance=10%, Voltage=25V, Case/Package=0402, Depth=0.5mm, Height=0.5mm, Lead Free="Lead Free", Length=1mm, Mount="Surface Mount", Packaging="Tape and Reel", Radiation Hardening=No, Thickness=0.022inch, Voltage Rating=25V, Voltage Rating (DC)=25V, Width=0.02inch
C15: library part CMP-13271-000002-1, "CAP CER 10UF 10V X5R 0402", Capacitance=10uF, Manufacturer=Samsung, Temperature="-55°C to +85°C", Temperature Characteristic=X5R, Temperature Coefficient=15%, Temperature Range High=+85°C, Temperature Range Low=-55°C, Tolerance=20%, Voltage Rating=10V, Automotive=No, Category=Cap, ComponentLink2Description=Datasheet, ComponentLink2URL=http://www.samsungsem.com/kr/support/product-search/mlcc/__icsFiles/afieldfile/2019/05/10/19-CL05A106MP5NUNC.pdf, Device Class L1="Passive Components", Device Class L2=Capacitors, Device Class L3="Ceramic Capacitors", Digikey Description="CAP CER 10UF 10V X5R 0402", Height=0.7mm, Ipc Land Pattern Name=CAPC10050X50, Lead Free=Yes, Manufacturer Part Number=CL05A106MP5NUNC, Material=Ceramic, Octopart=https://octopart.com/cl05a106mp5nunc-samsung-22457395, Package=CL05A106MP5NUNC, RoHS=TRUE
CS1: library part CMP-04895-000055-1, "IC CURR SENSE 1 CIRCUIT SOT23-6", Ambient Temperature Range High=+125°C, Ambient Temperature Range Low=-40°C, Input Bias Current=75uA, Input Offset Voltage=0.1mV, Manufacturer="Texas Instruments", Max Junction Temp=+150°C, Max Supply Voltage=5.5V, Min Supply Voltage=2.7V, Nominal Supply Current=195uA, Output Current Per Channel=8mA, Package=DBV0006A, Temperature="-40°C to +125°C", Voltage Gain=0.02V/mV, Automotive=No, Bandwidth=350kHz, Category=IC, ComponentLink2Description=Datasheet, ComponentLink2URL=http://www.ti.com/lit/ds/symlink/ina181.pdf, Device Class L1="Integrated Circuits (ICs)", Device Class L2="Linear ICs", Device Class L3=Instrumentation, Digikey Description="IC CURR SENSE 1 CIRCUIT SOT23-6", Height=1.45mm, Lead Free=Yes, Manufacturer Part Number=INA181A1IDBVR, Mouser Description="26V bi-directional current sense amplifier for cost-sensitive systems 6-SOT-23 -40 to 125", Number of Channels=1, Octopart=https://octopart.com/ina181a1idbvr-texas+instruments-81856289, RoHS=TRUE, Standoff Height=0mm, Temperature Range High=+125°C, Temperature Range Low=-40°C
CS2: "Operational Amplifier, 1 Func, 500uV Offset-Max, PDSO6", Average Bias Current-Max (IIB)=75uA, Case/Package=SOP, Input Offset Voltage-Max=500uV, Manufacturer="Texas Instruments", Max Operating Temperature=125°C, Min Operating Temperature=-40°C, Nominal Supply Voltage=5V, Package Body Material=Plastic, Package Shape=Rectangular, Package Style="SMALL OUTLINEMeter", Peak Reflow Temperature (Cel)=260°C, Supplier Part Number=296-47658-1-ND, Supply Voltage Limit-Max=5.5V, Temperature Grade=AUTOMOTIVE, Amplifier Type="OPERATIONAL AMPLIFIER", Category="Amplifiers - Op Amps, Buffer, Instrumentation", Channels=1, Common-mode Reject Ratio-Nom=100dB, ComponentLink1Description=https://www.ti.com:443/lit/ds/symlink/ina181.pdf?src-supplier=IHS+Markit, ComponentLink1URL=https://www.ti.com:443/lit/ds/symlink/ina181.pdf?src-supplier=IHS+Markit, ComponentLink2Description=http://www.ti.com/lit/ds/symlink/ina181.pdf?src-supplier=Digikey, ComponentLink2URL=http://www.ti.com/lit/ds/symlink/ina181.pdf?src-supplier=Digikey, JESD-30 Code=R-PDSO-G6, JESD-609 Code=e3, Manufacturer Part Number=INA181A3IDBVR, Moisture Sensitivity Level=1, Pins=6, Pricing="1=0.43, 10=0.297, 25=0.2652, 100=0.2296, 250=0.21268, 500=0.20246, 1000=0.19404 (USD)", Reach SVHC Compliant=Yes, RoHS=Yes, RoHS Compliant=Yes, Slew Rate=2V/µs, Stock=8886, Supplier=Digikey, Surface Mount=Yes, Terminal Finish=Tin, Terminal Form="Gull Wing", Terminal Position=DUAL, Unity Gain BW-Nom=350kHz
D1: "Automotive, dual, 3-pF, ±24-V, ±30-kV ESD protection diode for CAN and in-vehicle networks 3-SOT-23 -55 to 150", Manufacturer="Texas Instruments", Supplier Part Number=296-ESD2CAN24DBZRQ1CT-ND, Category="Integrated Circuits (ICs)", Manufacturer Part Number=ESD2CAN24DBZRQ1, Pricing="1=0.22, 10=0.149, 25=0.1316, 100=0.1125, 250=0.10328, 500=0.09774, 1000=0.09319 (USD)", RoHS=No, Stock=12405, Supplier=Digikey
D2 D3 D4: library part CMP-02520-000012-1, "LED RED 0603 SMD", Ambient Temperature Range High=+85°C, Ambient Temperature Range Low=-35°C, Colour=Red, Forward Current=20mA, Forward Voltage=2V, Manufacturer=Vishay, Package=6.541-5092.01-4, Power Dissipation=75mW, Reverse Voltage=5V, Temperature="-35°C to +85°C", Automotive=No, Category=Diode, ComponentLink2Description=Datasheet, ComponentLink2URL=http://www.vishay.com/docs/82437/vlmo1300.pdf, Device Class L1=Optoelectronics, Device Class L2=LEDs, Device Class L3=unset, Digikey Description="LED RED 0603 SMD", Height=1mm, Lead Free=Yes, Led Orientation="Top View", Luminous Intensity=54mcd, Manufacturer Part Number=VLMS1300-GS08, Mouser Description="Standard LEDs - SMD Super Red Clear Non-Diff", Octopart=https://octopart.com/vlms1300-gs08-vishay-21709201, Peak Emmision Wavelength=639nm, RoHS=TRUE, Temperature Range High=+85°C, Temperature Range Low=-35°C, Viewing Angle=130°, Wavelength=631nm
J1: library part CMP-15831-000009-1, "CONN HEADER VERT 2POS 2.54MM", Current Rating=3A, Manufacturer=Harwin, Temperature="-40°C to +105°C", Temperature Range High=+105°C, Temperature Range Low=-40°C, Automotive=No, Category=Conn, ComponentLink2Description=Datasheet, ComponentLink2URL=https://cdn.harwin.com/pdfs/M20-999.pdf, Conn Gender=Male, Conn Orientation=Vertical, Contact Material=Tin,Nickel, Device Class L1=Connectors, Device Class L2="Headers and Wire Housings", Device Class L3=unset, Digikey Description="CONN HEADER VERT 2POS 2.54MM", Height=8.99mm, Lead Free=Yes, Manufacturer Part Number=M20-9990246, Mouser Description="2.54mm (0.1\") Pitch SIL Vertical PC Tail Pin Header, 6.1mm mating pin height, tin, 2 contacts", Number of Contacts=2, Number of Rows=1, Octopart=https://octopart.com/m20-9990246-harwin-2590635, Package=M20-9990246, Pitch=2.54mm, RoHS=TRUE
J3 J6: library part CMP-1502-03324-2, Current Rating=16A, Max Operating Temperature=120°C, Min Operating Temperature=-30°C, Voltage Rating=300V, Contact Material="Nickel, Tin", Height=11.6mm, Lead Pitch=5mm, NexarPartId=78871135, Number of Contacts=2, Number of Pins=2, Number of Rows=1, Packaging=Box, RoHS=Non-Compliant
J5: library part TB006-508-03BE, "2~24 Poles, Screw Type, Horizontal, 5.08 Pitch, 26~14 (AWG), Terminal Block Connector", Contact Resistance=20mΩ, Current Rating=1A, Insulation Resistance=5GΩ, Manufacturer="Adam Tech", Max Operating Temperature=105°C, Min Operating Temperature=-55°C, Supplier Part Number=2057-2PH1-09-UA-ND, Category="Card Edge Connectors", ComponentLink1Description=https://datasheet.octopart.com:443/2PH1-09-UA-Adam-Tech-datasheet-21182828.pdf?src-supplier=IHS, ComponentLink1URL=https://datasheet.octopart.com:443/2PH1-09-UA-Adam-Tech-datasheet-21182828.pdf?src-supplier=IHS, ComponentLink2Description=https://datasheet.octopart.com:443/2PH1-09-UA-Adam-Tech-datasheet-12511781.pdf?src-supplier=Future+Electronics, ComponentLink2URL=https://datasheet.octopart.com:443/2PH1-09-UA-Adam-Tech-datasheet-12511781.pdf?src-supplier=Future+Electronics, ComponentLink3Description=http://sigma.octopart.com:80/rohs_statement/Adam-Tech-company-22.pdf?src-supplier=Compliance+Statements, ComponentLink3URL=http://sigma.octopart.com:80/rohs_statement/Adam-Tech-company-22.pdf?src-supplier=Compliance+Statements, ComponentLink4Description=http://sigma.octopart.com:80/reach_statement/Adam-Tech-company-23.pdf?src-supplier=Compliance+Statements, ComponentLink4URL=http://sigma.octopart.com:80/reach_statement/Adam-Tech-company-23.pdf?src-supplier=Compliance+Statements, Contact Gender=Male, Contact Material=Brass, Lead Free="Lead Free", Lifecycle Status=Production, Manufacturer Part Number=2PH1-09-UA, Number of Rows=1, Pins=9, Pricing="1=0.17, 10=0.141, 100=0.1195, 500=0.1066, 1000=0.10151, 5000=0.0906, 10000=0.08627 (USD)", REACH SVHC=Yes, RoHS=Compliant, Stock=1766, Supplier=DigiKey, Terminal Pitch=2mm
J7: "Barrier Strip Terminal Block", Manufacturer="Same Sky", Supplier Part Number=102-6189-ND, Category="Terminal Blocks", ComponentLink1Description=https://www.cuidevices.com/product/resource/digikeypdf/tb005-762.pdf?src-supplier=Digikey, ComponentLink1URL=https://www.cuidevices.com/product/resource/digikeypdf/tb005-762.pdf?src-supplier=Digikey, ComponentLink2Description=https://datasheet.octopart.com/TB005-762-02BE-Same-Sky-datasheet-182050252.pdf?src-supplier=Future+Electronics, ComponentLink2URL=https://datasheet.octopart.com/TB005-762-02BE-Same-Sky-datasheet-182050252.pdf?src-supplier=Future+Electronics, ComponentLink3Description=https://datasheet.octopart.com/TB005-762-02BE-CUI-Devices-datasheet-142371921.pdf?src-supplier=Future+Electronics, ComponentLink3URL=https://datasheet.octopart.com/TB005-762-02BE-CUI-Devices-datasheet-142371921.pdf?src-supplier=Future+Electronics, ComponentLink4Description=https://datasheet.octopart.com/TB005-762-02BE-Same-Sky-datasheet-182881445.pdf?src-supplier=Electro+Sonic, ComponentLink4URL=https://datasheet.octopart.com/TB005-762-02BE-Same-Sky-datasheet-182881445.pdf?src-supplier=Electro+Sonic, ComponentLink5Description=https://datasheet.octopart.com/TB005-762-02BE-Same-Sky-datasheet-189105715.pdf?src-supplier=Master+Electronics, ComponentLink5URL=https://datasheet.octopart.com/TB005-762-02BE-Same-Sky-datasheet-189105715.pdf?src-supplier=Master+Electronics, Manufacturer Part Number=TB005-762-02BE, Pricing="1=0.78, 10=0.574, 25=0.5, 50=0.4504, 100=0.4073, 250=0.36028, 600=0.3253, 1200=0.30358, 5400=0.27068 (USD)", RoHS=Yes, Stock=4809, Supplier=Digikey
J8: "Socket DC Supply Connector Female", Package=Package, Availability="Not in stock", Check_prices=https://www.snapeda.com/parts/XT60PW-F/AMASS/view-part/?ref=eda, MF=AMASS, MP=XT60PW-F, Price=None, SnapEDA_Link=https://www.snapeda.com/parts/XT60PW-F/AMASS/view-part/?ref=snap
P1 P2 P4 P5: JLCPCB Part Class="Extended Part", Manufacturer=BOOMELE(博穆精密), Manufacturer Part=2.54-1*1P针, spicePre=P, spiceSymbolName=Header-Male-2.54_1x1, Supplier=LCSC, Supplier Part=C81276
P3: Manufacturer=ReliaPro, Manufacturer Part=Header-Female-2.54_1x4, spicePre=P, spiceSymbolName=Header-Female-2.54_1x4, Supplier=LCSC, Supplier Part=C124413
Q1: library part CMP-20235-000001-1, "NPN TRANSISTOR 1.5A 40V SOT-23 R", Case/Package=TO-236-3, Collector Emitter Breakdown Voltage=25V, Collector Emitter Voltage (VCEO)=400mV, Max Collector Current=1.5A, Max Power Dissipation=300mW, Transition Frequency=100MHz, Max Breakdown Voltage=25V, Mount="Surface Mount", Packaging="Tape and Reel", RoHS Compliant=Yes
Q2: library part CMP-1048-00374-1, "General Purpose Transistor, PNP Silicon, 3-Pin SC70, Pb-Free, Tape and Reel", Manufacturer="On Semiconductor", ComponentLink1Description="Manufacturer URL", ComponentLink1URL=http://www.onsemi.com/, ComponentLink2Description=Datasheet, ComponentLink2URL=http://www.onsemi.cn/pub_link/Collateral/MMBT3904WT1-D.PDF, ComponentLink3Description="Package Specification", ComponentLink3URL=http://www.onsemi.cn/pub_link/Collateral/419-04.PDF, DatasheetVersion="Rev. 8", fT Min (MHz)=250, IC Continuous (A)=-0.2, Mounting Technology="Surface Mount", Note1=0, PackageDescription="3-Pin Small Outline Transistor, Body 2 x 1.25 mm, Pitch 0.65 mm", PackageReference=SC-70-3-419-04, PackageVersion="Rev. N, 11/2008", Packing="Tape and Reel", PartNumber=SMMBT3906WT1G, Polarity=PNP, RoHS=TRUE
R1 R2: library part CMP-2002-01013-2, "RES SMD 60.4 OHM 1% 1/10W 0402", Case Code (Imperial)=0402, Case Code (Metric)=1005, Max Operating Temperature=155°C, Max Power Dissipation=100mW, Min Operating Temperature=-55°C, Package Quantity=1, Resistance=60.4R, Resistance Tolerance=1%, Resistor Type="Thick Film", Temperature Coefficient=100ppm/°C, Voltage Rating=50V, Case/Package=0402, Construction=Rectangular, Contact Plating=Tin, Depth=0.5mm, Features="Automotive AEC-Q200", Height=0.016inch, Lead Free="Contains Lead", Length=1mm, Military Standard=Not, Mount="Surface Mount", Number of Terminations=2, Packaging="Tape and Reel", Power Rating=100mW, REACH SVHC="No SVHC", RoHS Compliant=Yes, Series=ERJ, Termination=SMD/SMT, Tolerance=1%, Voltage Rating (DC)=50V, Width=0.02inch
R3 R4: library part CMP-2002-08011-2, Case Code (Imperial)=0402, Max Operating Temperature=155°C, Max Power Dissipation=63mW, Min Operating Temperature=-55°C, Resistance=4.7kΩ, Temperature Coefficient=100ppm/°C, Tolerance=5%, Voltage Rating=50V, Case/Package=0402, Composition="Thick Film", Depth=500µm, Features="Moisture Resistant", Height=350µm, Lead Free="Lead Free", Length=1mm, Military Standard=Not, Number of Pins=2, Number of Terminations=2, Packaging="Tape & Reel", Power Rating=63mW, REACH SVHC="No SVHC", RoHS=Compliant, Schedule B="8533210045, 8533210045", Termination=SMD/SMT, Voltage Rating (AC)=50V, Voltage Rating (DC)=50V, Width=500µm
R5 R6 R11: library part CMP-1666-00003-5, "RES Thick Film, 1kΩ, 1%, 0.1W, 100ppm/°C, 0603", Case Code (Imperial)=0603, Case Code (Metric)=1608, Max Operating Temperature=155°C, Max Power Dissipation=100mW, Min Operating Temperature=-55°C, Package Quantity=10, Resistance=1kR, Temperature Coefficient=100ppm/°C, Tolerance=1%, Voltage Rating=75V, Case/Package=0603, Composition="Thick Film", Contact Plating=Tin, Depth=0.85mm, Features="Automotive AEC-Q200", Height=0.45mm, Lead Free="Lead Free", Length=1.55mm, Military Standard=Not, Mount="Surface Mount", Number of Pins=2, Number of Terminations=2, Packaging="Tape and Reel", Power Rating=100mW, Radiation Hardening=No, Termination=SMD/SMT, Voltage Rating (DC)=75V, Weight=7.1E-05oz, Width=0.033inch
R7 R8 R9: library part CMP-2002-07915-3, "RES 10K OHM 5% 1/16W 0402", Case Code (Imperial)=0402, Case Code (Metric)=1005, Max Operating Temperature=155°C, Max Power Dissipation=63mW, Min Operating Temperature=-55°C, Package Quantity=1, Power Rating=62.5mW, Resistance=10kR, Resistance Tolerance=5%, Resistor Type="Thick Film", Temperature Coefficient=100ppm/°C, Voltage Rating=50V, Case/Package=0402, Construction=Rectangular, Depth=0.5mm, Features="Moisture Resistant", Height=0.016inch, Lead Free="Lead Free", Length=0.039inch, Military Standard=Not, Number of Terminations=2, Packaging="Tape and Reel", RoHS Compliant=Yes, Series=RC, Size Code=0402, Termination=SMD/SMT, Tolerance=5%, Width=0.02inch
R10 R12: "Fixed Resistor, Metal Strip, 3W, 0.002ohm, 0.077V, 1% +/-Tol, 600ppm/Cel, Surface Mount, 4527", Case/Package=4527, Manufacturer="Vishay Dale", Max Operating Temperature=275°C, Min Operating Temperature=-65°C, Package Height=2.41mm, Package Length=11.56mm, Package Shape=Rectangular, Package Width=6.98mm, Power=3W, Rated Temperature=70°C, Resistor Type="FIXED RESISTOR", Supplier Part Number=WSRB-.002CT-ND, Temperature Coefficient (ppm/Cel)=-600,600, Tolerance=1%, Category="Chip SMD Resistors", ComponentLink1Description=https://datasheet.ciiva.com:443/pdfs/VipMasterIC/IC/VISH/VISH-S-A0007103483/VISH-S-A0007103483-1.pdf?src-supplier=IHS+Markit, ComponentLink1URL=https://datasheet.ciiva.com:443/pdfs/VipMasterIC/IC/VISH/VISH-S-A0007103483/VISH-S-A0007103483-1.pdf?src-supplier=IHS+Markit, ComponentLink2Description=https://datasheet.ciiva.com/11812/0900766b80d81e5e-11812948.pdf?src-supplier=Rs, ComponentLink2URL=https://datasheet.ciiva.com/11812/0900766b80d81e5e-11812948.pdf?src-supplier=Rs, ComponentLink3Description=https://datasheet.ciiva.com/2484/wsr-2484757.pdf?src-supplier=Digikey, ComponentLink3URL=https://datasheet.ciiva.com/2484/wsr-2484757.pdf?src-supplier=Digikey, ComponentLink4Description=https://datasheet.ciiva.com/2484/wsr-2484758.pdf?src-supplier=Digikey, ComponentLink4URL=https://datasheet.ciiva.com/2484/wsr-2484758.pdf?src-supplier=Digikey, ComponentLink5Description=https://datasheet.ciiva.com/2484/wsr-2484759.pdf?src-supplier=Digikey, ComponentLink5URL=https://datasheet.ciiva.com/2484/wsr-2484759.pdf?src-supplier=Digikey, ComponentLink6Description=https://datasheet.ciiva.com/16375/wsr-16375639.pdf?src-supplier=Future+Electronics, ComponentLink6URL=https://datasheet.ciiva.com/16375/wsr-16375639.pdf?src-supplier=Future+Electronics, Construction=Chip, JESD-609 Code=e2, Manufacturer Part Number=WSR32L000FEA, Mounting Technology="Surface Mount", Packaging="Tape and Reel", Pins=2, Pricing="1=1.54, 10=1.022, 25=0.906, 50=0.8386, 100=0.7852, 250=0.73096, 500=0.69258 (USD)", Reach SVHC Compliant=Yes, Reference Standard=AEC-Q200, RoHS=Yes, RoHS Compliant=Yes, Stock=1901, Supplier=Digikey, Technology="METAL STRIP", Terminal Finish=Tin, Termination=Wraparound
R13 R14 R15 R16 R19: library part CMP-2000-06948-1, "Chip Resistor, 10 kOhm, +/- 1%, 0.1 W, -55 to 155 degC, 0603 (1608 Metric), RoHS, Tape and Reel", Case Style=Molded, Manufacturer=Yageo, Operating Temp Range=-55Cto155C, Package / Case=0603, Package Description="2-Pin Surface Mount Device, Body 1.6 x 0.8 mm", Power Rating(s)=1/10W, Resistance=10kohm, Temperature Coefficient=±100, Tolerance (+ or -)=1%, Construction=Rectangular, Datasheet URL=http://www.yageo.com/documents/recent/PYu-RC_Group_51_RoHS_L_7.pdf, Datasheet Version="Rev. 7, 05/2017", Failure Rate=NotRequired, Manufacturer URL=http://www.yageo.com/, Military Standard=NotRequired, Mounting Technology=SurfaceMount, Package Reference=0603, Packaging=TapeandReel, Product Depth (mm)=0.8mm, Product Height (mm)=0.45mm, Product Length (mm)=1.6mm, Termination Style=NotRequired, Type=ThickFilm
U1: library part CMP-0315-00015-3, "IC TRANSCEIVER HALF 1/1 8SOIC", Case/Package=D, Max Operating Temperature=85°C, Max Supply Current=17mA, Max Supply Voltage=3.6V, Min Operating Temperature=-40°C, Min Supply Voltage=3V, Operating Supply Voltage=3.3V, Package Quantity=1, Contact Plating=Gold, Data Rate=1Mbps, Lead Free="Lead Free", Nominal Supply Current=17mA, Number of Drivers=1, Number of I/Os=2, Number of Pins=8, Number of Receive Buffers=1, Number of Receivers=1, Number of Transceivers=1, Number of Transmit Buffers=1, Packaging="Tape and Reel", Radiation Hardening=No, REACH SVHC="No SVHC", Termination=SMD/SMT, Weight=0.002561oz
U2: library part CMP-12756-000028-1, "IC REG LINEAR 3.3V 800MA SOT223", Case/Package=SOT-223, Dropout Voltage=1.2V, Max Input Voltage=15V, Max Operating Temperature=125°C, Max Output Current=1.35A, Min Current Limit=1A, Min Operating Temperature=-20°C, Output Current=800mA, Output Voltage=3.3V, Package Quantity=4000, Power Supply Rejection Ratio (PSRR)=70dB, Quiescent Current=6mA, Reference Voltage=1.262V, Accuracy=1%, Height=1.7mm, Lead Free="Lead Free", Length=6.7mm, Mount="Surface Mount", Number of Outputs=1, Number of Pins=4, Number of Regulators=1, Output Type=Fixed, Packaging="Tape and Reel", Polarity=Positive, Width=3.7mm

## Free pads (board coordinates)
  round 39.37 hole 125.98: 3(196.85,196.85) 3(196.85,2598.43) 3(2952.76,196.85) 3(2952.76,2598.43)

## Via types
v1: diameter 24, hole 12, Top Layer to Bottom Layer, tented both sides, 41 vias

## Nets (pads, with @x,y where several pads share a name; then routed paths per layer and width w, separated by ;. In a path a pad name is that pad's centre, name@x,y a point inside that pad or via, vN(x,y) a via of type N, cw(c..) or ccw(c..) an arc to the next point about the centre after c; other vN are vias at no path point)
3V3: 34.9 C2.2 C5.2 C7.1 C11.1 C12.2 C13.2 C14.1 C18.2 CS1.6 CS2.6 DS1.3 DS2.3 P3.1 Q2.2 R6.2 R7.1 R11.2 R13.2 R14.2 U1.3 U2.2 U2.4 | length 6321.8
  Top Layer w10: U2.2 1495.49,1894.17 1541.83,1894.17 1554,1882 1602,1882 C14.1 ; P3.1 2500,1102 C18.2
  Top Layer w20: C5.2 1749.9,2245.9 v1(1697,2193) 1777,2193 1935,2351 1935,2492 1916.1,2510.9 C2.2 1877,2511.75 1860.75,2528 U1.3 ; R7.1 2327.44,1048.37 2339.16,1036.65 2339.16,973.27 R6.2@2334.4,968.5 ; R6.2@2332.68,968.5 v1(2397.64,968.5) Q2.2
  Top Layer w27.33: C13.2 C13.2@1339.22,1553.36 ; 1535.78,1550.06 C12.2
  Top Layer w30: R14.2 1281.88,563.2 1281.88,722.79 1415.39,856.3 v1(1511.35,856.3) ; 1289.37,1811.02 1289.37,1791.34 1281.67,1783.64 1281.67,1648 ; 1358.27,1732.28 1417.32,1732.28 ; R11.2 1404.47,1648.24 1404.24,1648 1281.67,1648 ; 1535.78,1550.06 1342.52,1550.06 1339.22,1553.36 1342.17,1550.41 DS2.3 1332.32,1499.63 1281.89,1550.06 1281.67,1550.06 1281.67,1648 ; C12.2@1555.12,1548.72 1555.12,1503.21 DS1.3 ; R13.2 2839.23,328.96 2839.23,486.87 v1(2844.49,492.13)
  Bottom Layer w20: v1(2397.64,968.5) 2453.94,968.5
  Bottom Layer w30: v1(1511.35,856.3) 1580.88,856.3 ; v1(1697,2193) 1578.88,2074.88 1578.88,858.3 1580.88,856.3 ; P3.1@2453.94,1151.57 2453.94,968.5 2453.94,861.24 2458.88,856.3 ; v1(2844.49,492.13) 2844.49,642.18 ; 34.9 2849.67,637 2844.49,642.18 ; 1580.88,856.3 2458.88,856.3 ; 2458.88,856.3 2630.37,856.3 2844.49,642.18
  other v1: 1574.8,1929.13
3V3_2: 33.3 R3.2 R4.2 | length 693.7
  Top Layer w30: v1(1965.17,2019.51) 1965.68,2019 R3.2 ; R4.2 2233.66,2019 v1(2234.17,2019.51)
  Bottom Layer w30: v1(1965.17,2019.51) v1(2234.17,2019.51) 2448.84,2019.51 33.3
+5: 33.1 34.1 34.2 C15.1 C16.1 C20.1 C?.2 J6.1 P2.1 U2.3 | length 4493.8
  Top Layer w25: J6.1 2703.43,2376.48 C16.1
  Top Layer w27.33: C?.2@2765.66,2003.66 C?.2
  Top Layer w30: P2.1 C20.1@352.9,2233.8 ; 33.1 2753,1991 C?.2@2765.66,2003.66
  Top Layer w40: 33.1 2753,1747 34.1
  Top Layer w50: P2.1 444.68,2059 1447,2059 1501,2005 1772.43,2005 1790,1987.43 v1(1790,1819)
  Bottom Layer w30: J6.1 2703.43,2088.57 2760,2032 2760,1922.35 33.1
  Bottom Layer w40: 34.2 34.1
  Bottom Layer w50: v1(1790,1819) 2656.65,1819 33.1
CAN+5V: 
CAN_N: C4.2 D1.1 Designator2.3 J1.2 R1.1 U1.6 | length 996
  Top Layer w10: J1.2 1180.39,2564 1198.66,2545.72 D1.1 1224.25,2545.72 1253.96,2575.43 1412.19,2575.43 R1.1 1493.53,2568.09 1533.62,2528 U1.6
  Bottom Layer w10: Designator2.3 943,2564 J1.2
CAN_P: C3.2 D1.2 Designator2.2 J1.1 R2.1 U1.7 | length 951.7
  Top Layer w6: D1.2 D1.2@1224.25,2470.92
  Top Layer w10: J1.1 1186.19,2464 1186.5,2464.31 1204.84,2464.31 D1.2 ; D1.2@1224.25,2470.92 1261.62,2433.55 R2.1 ; R2.1 1489.17,2433.55 1533.62,2478 U1.7
  Bottom Layer w10: Designator2.2 843,2464 J1.1
GND: 33.2 34.7 34.8 C1.1 C2.1 C3.1 C4.1 C5.1 C6.2 C7.2 C8.2 C9.1 C10.1 C11.2 C12.1 C13.1 C14.2 C15.2 C16.2 C18.1 C19.2 C20.2 C?.1 CS1.2 CS2.2 D1.3 D2.1 Designator2.1 DS1.1 DS2.1 J6.2 J8.2 J8.S1 J8.S2 P3.4 P4.1 P5.1 Q1.2 R5.2 R15.1 R16.1 R19.1 U1.2 U2.1 | length 2135.3
  Top Layer w10: C4.1 1323.82,2606.58 1323.82,2655.93 v1(1324.32,2656.43) ; v1(1326.32,2368.43) 1326.82,2368.93 1326.82,2402.28 C3.1 ; U1.2 1760.52,2478.5 C2.1@1877.6,2478.5 ; v1(1877,2444) 1877,2477.9 C2.1@1878.1,2479 ; C18.1 2632,1102 v1@2634,1100 ; C?.1 C?.1@2797.31,2005.5
  Top Layer w15: C10.1 1374.79,640.69 v1(1389.88,655.79) ; R16.1 1421.24,566.55 1421.24,617.24 v1(1422,618)
  Top Layer w20: v1(187,474) 209,452 C19.2 ; C20.2 v1(431,2239) ; v1(1199.88,505.79) C11.2 ; C8.2 1329.83,335.74 v1(1329.88,305.79) v1(1329.88,305.79) ; C8.2@1329.79,336.49 1329.79,384.67 1334.88,389.76 CS1.2 ; C13.1 1338.03,1584.65 1364.56,1584.65 1366.92,1587 v1(1368,1587) ; DS2.1 1456.52,1428.58 1456.52,1368.28 v1(1456.69,1368.11) ; v1(1489,1591) 1555.12,1591 ; C15.2 1524.11,2094.98 v1(1545.28,2116.14) 1545.28,2281.28 1551.25,2287.25 1551.25,2291.19 1558.06,2298 R19.1 1661,2298 C5.1 ; D2.1 1642.62,1722.44 1652.46,1732.28 v1(1653.54,1732.28) ; DS1.1 1673.05,1428.58 1673.05,1358.44 v1(1673.23,1358.27) ; v1(2050,961) 2051.08,961 2053.68,963.6 Q1.2 ; v1(2582,2362) 2599.9,2344.1 C16.2 ; v1(2627.95,1013.78) 2637.8,1003.94 R5.2 ; R15.1 2679.88,259.2 2687,252.08 v1(2687,251) ; v1(2739,200) 2739,201.08 2749.18,211.26 2749.18,235.74 2749.33,235.88 C9.1 ; v1(2739.88,575.79) 2739.88,574.7 2750.42,564.16 C6.2@2750.42,541.49 ; CS2.2 2749.88,539.55 2750.57,540.23 C6.2 ; C?.1@2797.31,2005.5 2849.31,2005.5 v1(2849.81,2006) ; C7.2 2870.38,366.34 2870.52,366.49 2894.5,366.49 2908.8,380.79 v1(2909.88,380.79)
  Top Layer w20.29: C12.1 1555.12,1591
  Top Layer w50: U2.1@1476.38,1821.75 U2.1 1478.24,1820.86 1536.36,1820.86 1543.28,1813.95 ; 1545.28,1813.95 1543.28,1813.95 ; C14.2 1686.9,1813.1 v1(1689,1811) ; C14.2@1606,1813.95 1543.28,1813.95
  other v1: 2635.71,1098.17 1346.32,2470.43 1284.32,2474.43 1284.53,2523.32 1345.32,2537.43
GPIO1: 33.4 U1.1 | length 1020.5
  Top Layer w10: U1.1 1831,2428 v1(1879,2380) ; v1(2405,2160) 2453,2112 33.4
  Bottom Layer w10: v1(1879,2380) 2099,2160 v1(2405,2160)
GPIO2: 33.5 U1.4 | length 1035.8
  Top Layer w10: U1.4 1760.52,2578.5 v1(1878.5,2578.5) ; v1(2297,2258) 2353,2202 33.5
  Bottom Layer w10: v1(1878.5,2578.5) 1976.5,2578.5 v1(2297,2258)
GPIO3: 33.6 34.4 | length 1235.5
  Top Layer w10: 33.6 2676.35,1492 2840,1492 2973,1359 2973,1183 3019,1137 34.4
GPIO4: 33.7 J3.1 R4.1 | length 737.5
  Top Layer w10: 33.7 2153,1961.12 2169,1977.12 R4.1 2169,2233.7 2287.43,2352.12 J3.1
GPIO5: 33.8 J3.2 R3.1 | length 708.7
  Top Layer w10: R3.1@2041.05,2017.03 2041.05,1938 2053,1926.05 33.8 ; R3.1 2037,2023.05 2037,2075 2090.57,2128.57 J3.2
GPIO6: 33.9 DS1.2 | length 537.5
  Top Layer w10: DS1.2 1682.72,1499.63 1953,1769.9 33.9
GPIO7: 34.3 J5.9 | length 1240.8
  Bottom Layer w10: J5.9 1954.91,1316.91 1954.91,1362.05 1994.86,1402 2898,1402 34.3
GPIO8: C8.1 CS1.1 J5.8 | length 1783.1
  Top Layer w10: C8.1@1299.98,336.49 1299.98,387.27 1297.48,389.76 CS1.1 1185.04,399.61 1122.05,462.6 1122.05,688.98 1476.38,1043.31 1953.31,1043.31 2053,1143 J5.8
GPIO9: 34.6 J5.7 | length 1180.8
  Bottom Layer w10: J5.7 2153,1258 2171,1240 2825,1240 2926,1139 2926,1001 2990,937 34.6
GPIO10: J5.6 P3.3 R8.2 R9.2 | length 686.5
  Top Layer w10: R8.2@1985.88,1017.79 2024.09,1056 2053,1056 2090,1093 2195.36,1093 2253.94,1151.57 2377.59,1027.92 2392.21,1027.92 R9.2@2396.51,1023.62 ; J5.6 2253.5,1314.5 2253.5,1148.5 P3.3
GPIO11: J5.5 P3.2 | length 167.4
  Top Layer w10: J5.5 2353.5,1314.5 2353.5,1148.5 P3.2
GPIO12: 34.5 J5.4 | length 952.6
  Top Layer w10: J5.4 2453,1357 2506,1410 2781,1410 2873,1318 2873,1106 2942,1037 34.5
GPIO13: C6.1 CS2.1 J5.3 | length 941.5
  Top Layer w10: J5.3 2780.38,1087.62 C6.1 ; C6.1@2781.22,540.79 2781.22,476.26 CS2.1
IN+: CS1.4 CS2.3 J7.2 R10.2 R12.2 | length 1549.1
  Top Layer w25: CS1.4 1477.37,501.97 1609.06,633.66 1638,633.66 1841.48,633.66 1869.36,605.79 J7.2 2456.22,605.79 2469.88,619.45 2469.88,490.79 2490.47,470.2 CS2.3
IN-: CS1.3 CS2.4 J7.1 R10.1 R12.1 | length 1550.4
  Top Layer w10: CS1.3@1372.28,389.76 CS1.3
  Top Layer w25: CS1.3@1372.28,389.76 1495.71,266.34 1638,266.34 1955.43,266.34 J7.1 2029.63,271.04 2450.96,271.04 2469.88,252.13 2469.88,356.73 2484.53,371.38 CS2.4
NetC1_2: C1.2 R1.2 R2.2 | length 93.9
  Top Layer w6: C1.2 1412.03,2508.32 1419.53,2500.82 ; R2.2 1419.53,2500.82 ; R1.2 1419.53,2500.82
NetC9_2: C9.2 CS2.5 R13.1 R15.2 | length 145.3
  Top Layer w25: R15.2 2750.47,310.79 ; C9.2 2749.88,311.38 ; CS2.5 2749.88,311.38 ; R13.1 2750.47,310.79 ; 2749.88,311.38 2750.47,310.79
NetC10_2: C10.2 CS1.5 R14.1 R16.2 | length 155.7
  Top Layer w15: R14.1@1330.47,561.85 1334.88,557.44 CS1.5 ; R14.1 R16.2 1364.98,570.1 1364.98,589.94 1344.88,610.04 C10.2
NetD2_2: D2.2 R11.1 | length 117
  Top Layer w30: R11.1@1463.76,1649 1560.42,1649 D2.2
NetD3_1: D3.1 R5.1 | length 53.5
  Top Layer w10: D3.1 2585.12,909.45 R5.1
NetD3_2: D3.2 Q2.3 | length 58
  Top Layer w10: Q2.3 2546.18,985.31 2567.12,985.31 D3.2
NetD4_1: D4.1 Q1.3 R7.2 | length 166.2
  Top Layer w10: Q1.3 2241.55,1001 2254.33,1013.78 2289.01,1013.78 2293.31,1018.08 R7.2 2293.31,979.33 2283.46,969.49
NetD4_2: D4.2 R6.1 | length 49.6
  Top Layer w10: 2283.46,910.43 2284.45,909.45 R6.1@2332.68,909.45
NetDS1_4: DS1.4 DS2.2 | length 157.1
  Top Layer w10: DS2.2 1459.91,1496.06 1496.06,1496.06 1505.91,1486.22 1505.91,1442.87 1511.76,1437.01 1550.45,1437.01 DS1.4
NetQ1_1: Q1.1 R8.1 | length 96.2
  Top Layer w10: R8.1 2082.9,1017 2104.3,1038.4 Q1.1
NetQ2_1: Q2.1 R9.1 | length 37.9
  Top Layer w10: R9.1@2426.32,1023.62 2428.29,1021.65 2460.63,1021.65 Q2.1
NetR19_2: R19.2 U1.8 | length 82.8
  Top Layer w10: R19.2 1563.17,2349.18 1569.98,2355.99 U1.8
RX: J5.2
SHIELD: 
TX: J5.1
VIN: C19.1 J8.1 P1.1 | length 475.3
  Top Layer w60: 329,450 352.9,473.9 P1.1 566.93,376.52 J8.1
pads on no net: DS2.4 U1.5

## Polygon pours and split planes (outlines as drawn)
GND on Top Layer "NONET_L-01_P-001" (solid, pour order 1): 1354.53,2458.32 1354.53,2548.32 1264.53,2548.32 1264.53,2458.32
NetC1_2 on Top Layer "NONET_L-01_P-001" (solid, pour order 0): 1434.53,2458.32 1434.53,2543.32 1369.53,2543.32 1369.53,2458.32
3V3 on Top Layer "NONET_L-01_P-001" (solid, pour order 5): 1190.94,1978.35 1417.32,1978.35 1417.32,1948.82 1594.49,1948.82 1594.49,1860.24 1427.17,1860.24 1427.17,1702.76 1190.94,1702.76
3V3 on Top Layer "NONET_L-01_P-001" (solid, pour order 4): 1254.88,575.79 1254.88,470.79 1314.88,470.79 1314.88,575.79
3V3 on Top Layer "NONET_L-01_P-001" (solid, pour order 3): 2774.88,400.79 2774.88,340.79 2804.88,340.79 2804.88,290.79 2854.88,290.79 2854.88,400.79
NetC10_2 on Top Layer "NONET_L-01_P-001" (solid, pour order 2): 1318.88,620.79 1318.88,500.79 1354.88,500.79 1354.88,540.79 1384.88,540.79 1394.88,550.79 1394.88,620.79
+5 on Top Layer "NONET_L-01_P-001" (solid, pour order 6): 1505.91,1978.35 1505.91,2116.14 1427.17,2116.14 1427.17,1978.35
GND on Layer 3 (split plane): 3129.51,20.1 20.1,20.1 20.1,2919.9 3129.51,2919.9
GND on Layer 1 (split plane): 3129.51,20.1 20.1,20.1 20.1,2919.9 3129.51,2919.9
GND on Layer 4 (split plane): 3129.51,20.1 20.1,20.1 20.1,2919.9 3129.51,2919.9
GND on Layer 2 (split plane): 3129.51,20.1 20.1,20.1 20.1,2919.9 3129.51,2919.9

## Silkscreen, mask and mechanical layers (free items; w line width, h text height)
Top Overlay:
  drawing of 19 lines, arcs and shapes, not listed
  text "CANL" at 1046,2661 h30
  text "CANL" at 497,2638 h30 r90
  text "CANH" at 507,2423 h30 r90
  text "CANH" at 1040,2356 h30
  text "GND" at 2028,2336 h30
  text "+5V" at 2213,2336 h30
  text "PHASE-A" at 2360.5,2318.5 h24
  text "PHASE-B" at 2581.6,2285.6 h24
  text "GND" at 485,2264 h30 r90
  text "GND" at 1016,2237 h30
  text "+5V" at 212,2226 h30
  text "Buck Converter" at 373.5,1496.5 h45
  text "LM2595" at 557.5,1380.5 h45
  text "PWR" at 2997,1337 h40 r90
  text "24V to 5V" at 483.5,1258.5 h45
  text "DIR" at 2336.38,1216.31 h18
  text "PWM" at 2229.09,1215.89 h18
  text "IO7" at 2907,1207 h40
  text "GND" at 2041.4,1145.73 h18
  text "3V3" at 2553.21,1145.73 h18
  text "IO3" at 2893,1109 h40
  text "IO12" at 2889,1015 h40
  text "IO9" at 2898,910 h40
  text "GND" at 2893,812 h40
  text "CURRENT_SENS" at 1808.68,782.71 h45
  text "GND" at 1062,717 h100 r90
  text "GND" at 2893,717 h40
  text "VIN" at 378,691 h100 r90
  text "3V3" at 2995,549 h40
Bottom Overlay:
  drawing of 19 lines, arcs and shapes, not listed